# Altium PCB Main_Power_Uint_3rd.PcbDoc (part 1 of 3)
Units mil, origin at the board's own origin, x right, y up, seen from the top; angles counter-clockwise.
Board outline 3820 x 5360 mil, 6 copper layers (Top Layer, GND1, PWR, SIG, GND2, Bottom Layer), stack 34.824 mil thick; 251 components, 157 nets, 795 pads, 616 vias.
Unrouted connection lines stored in the file: 8.
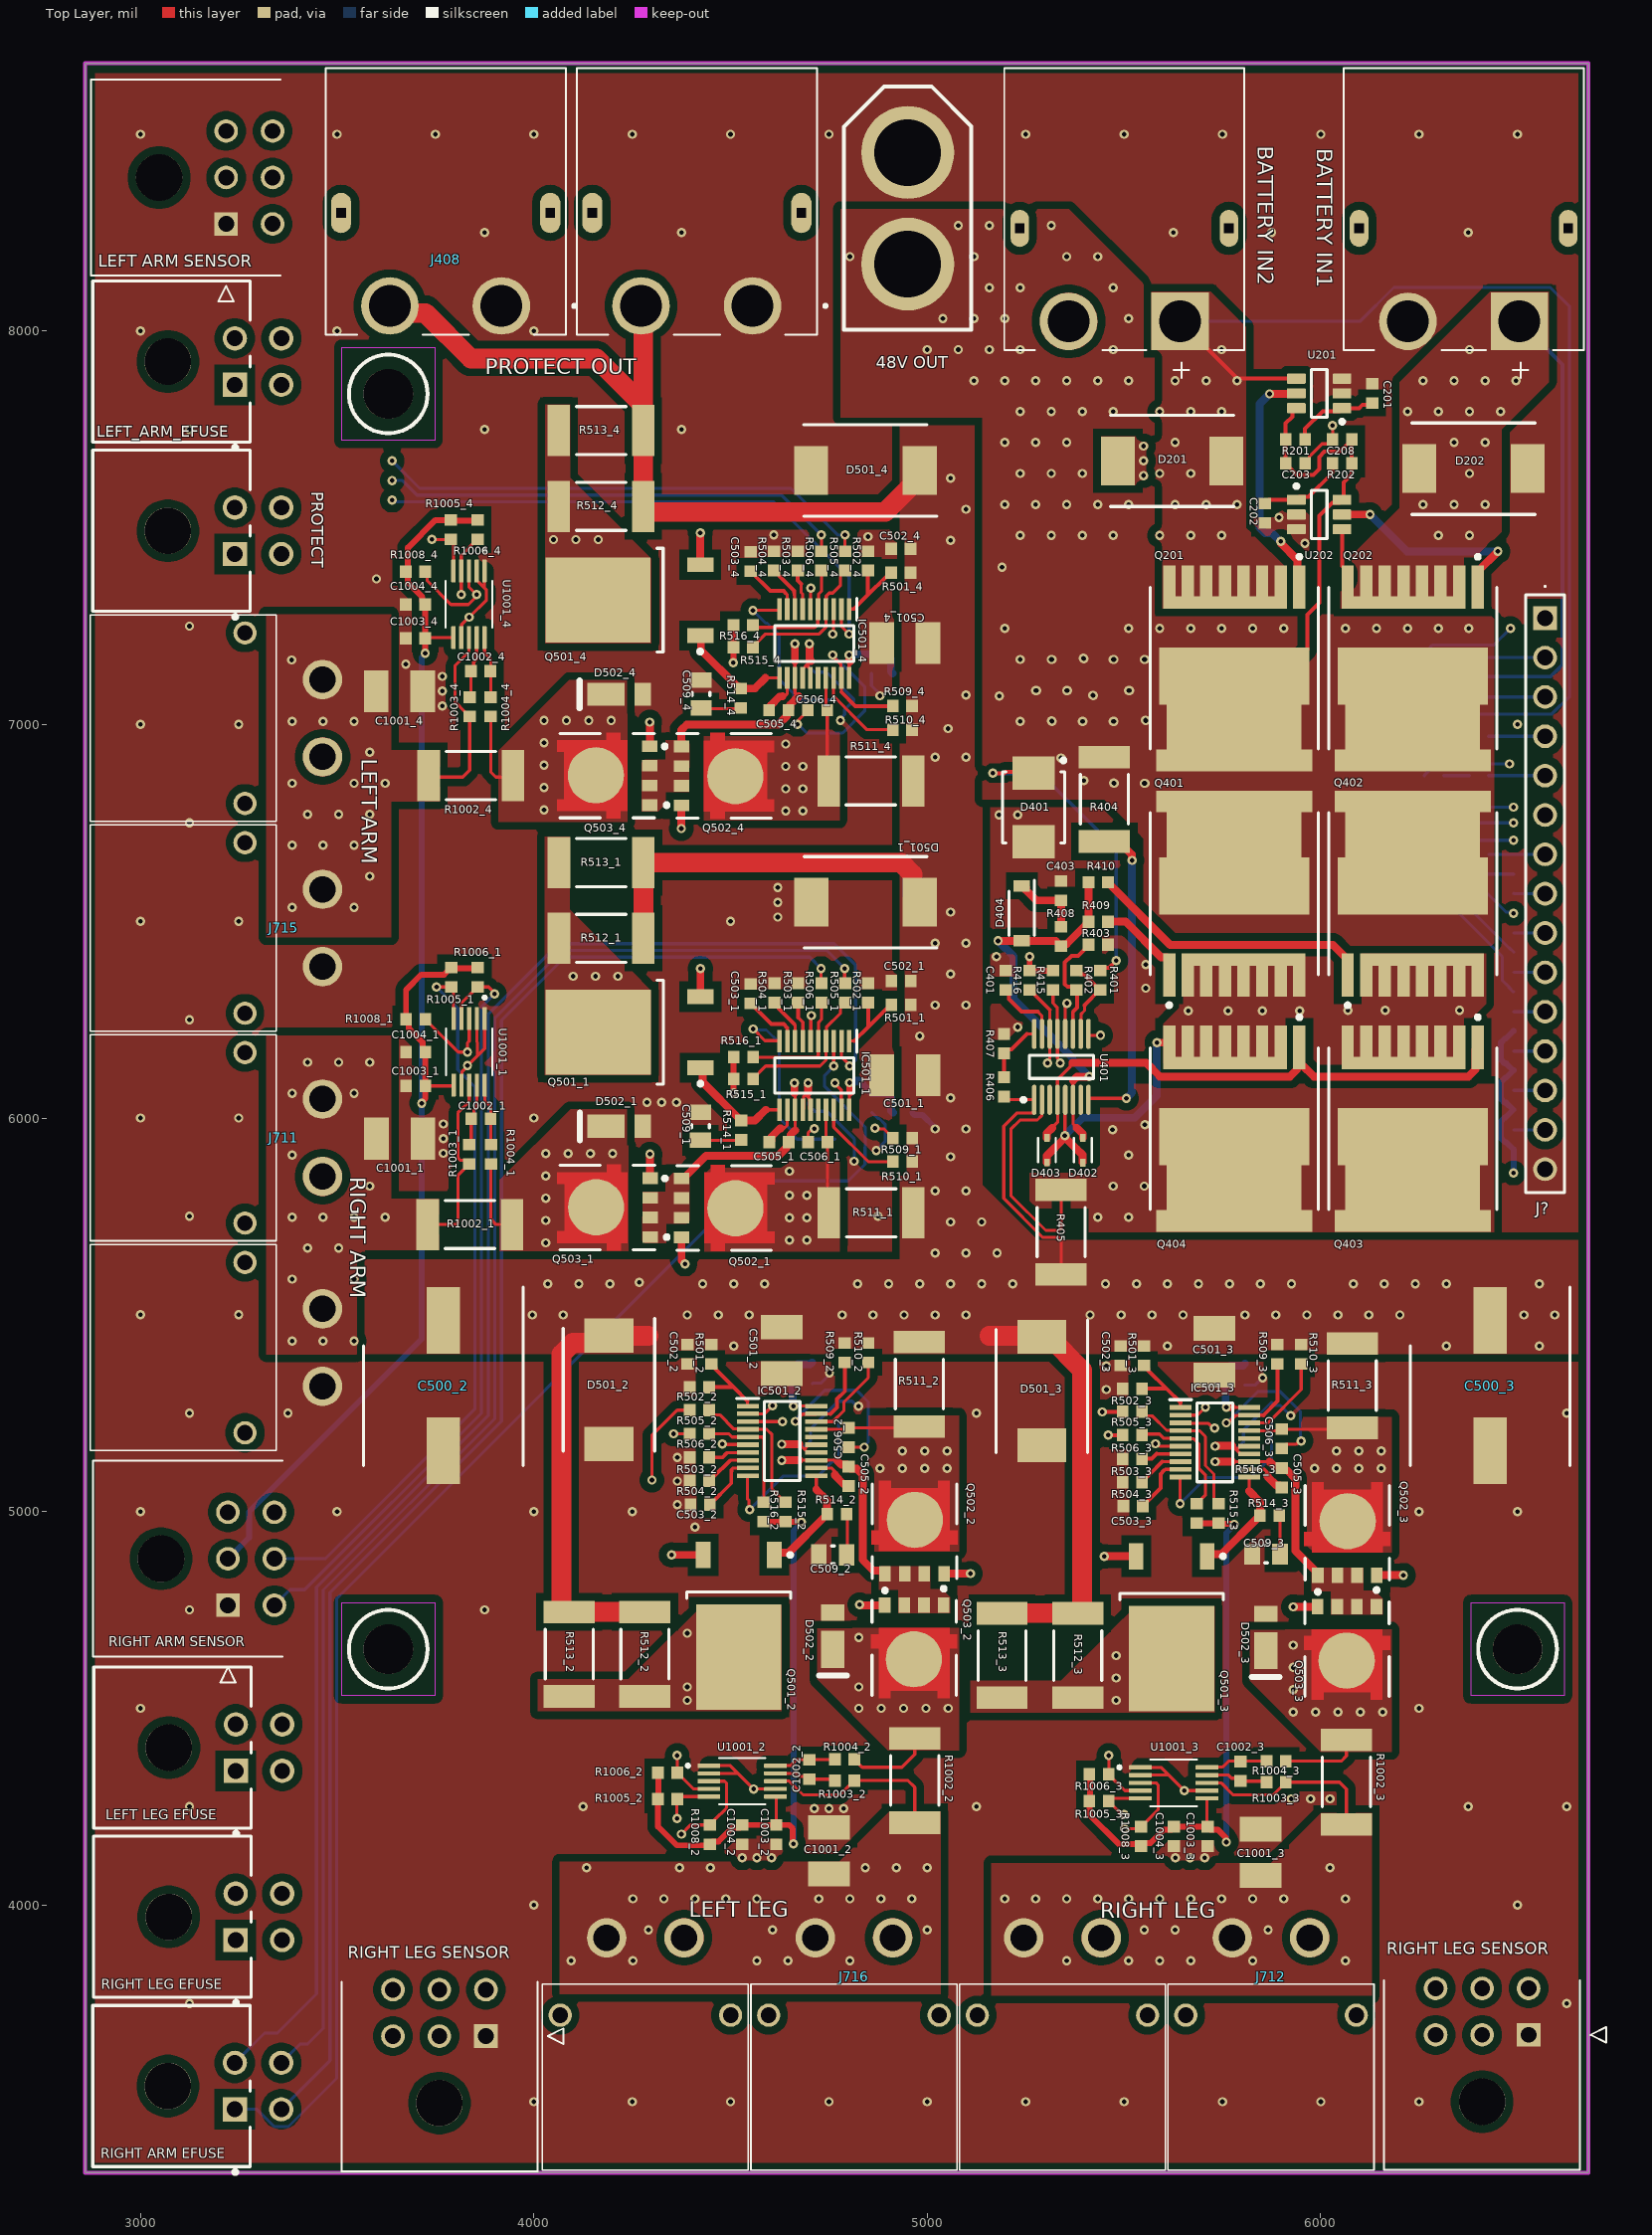
[diagram p0: Top Layer view]
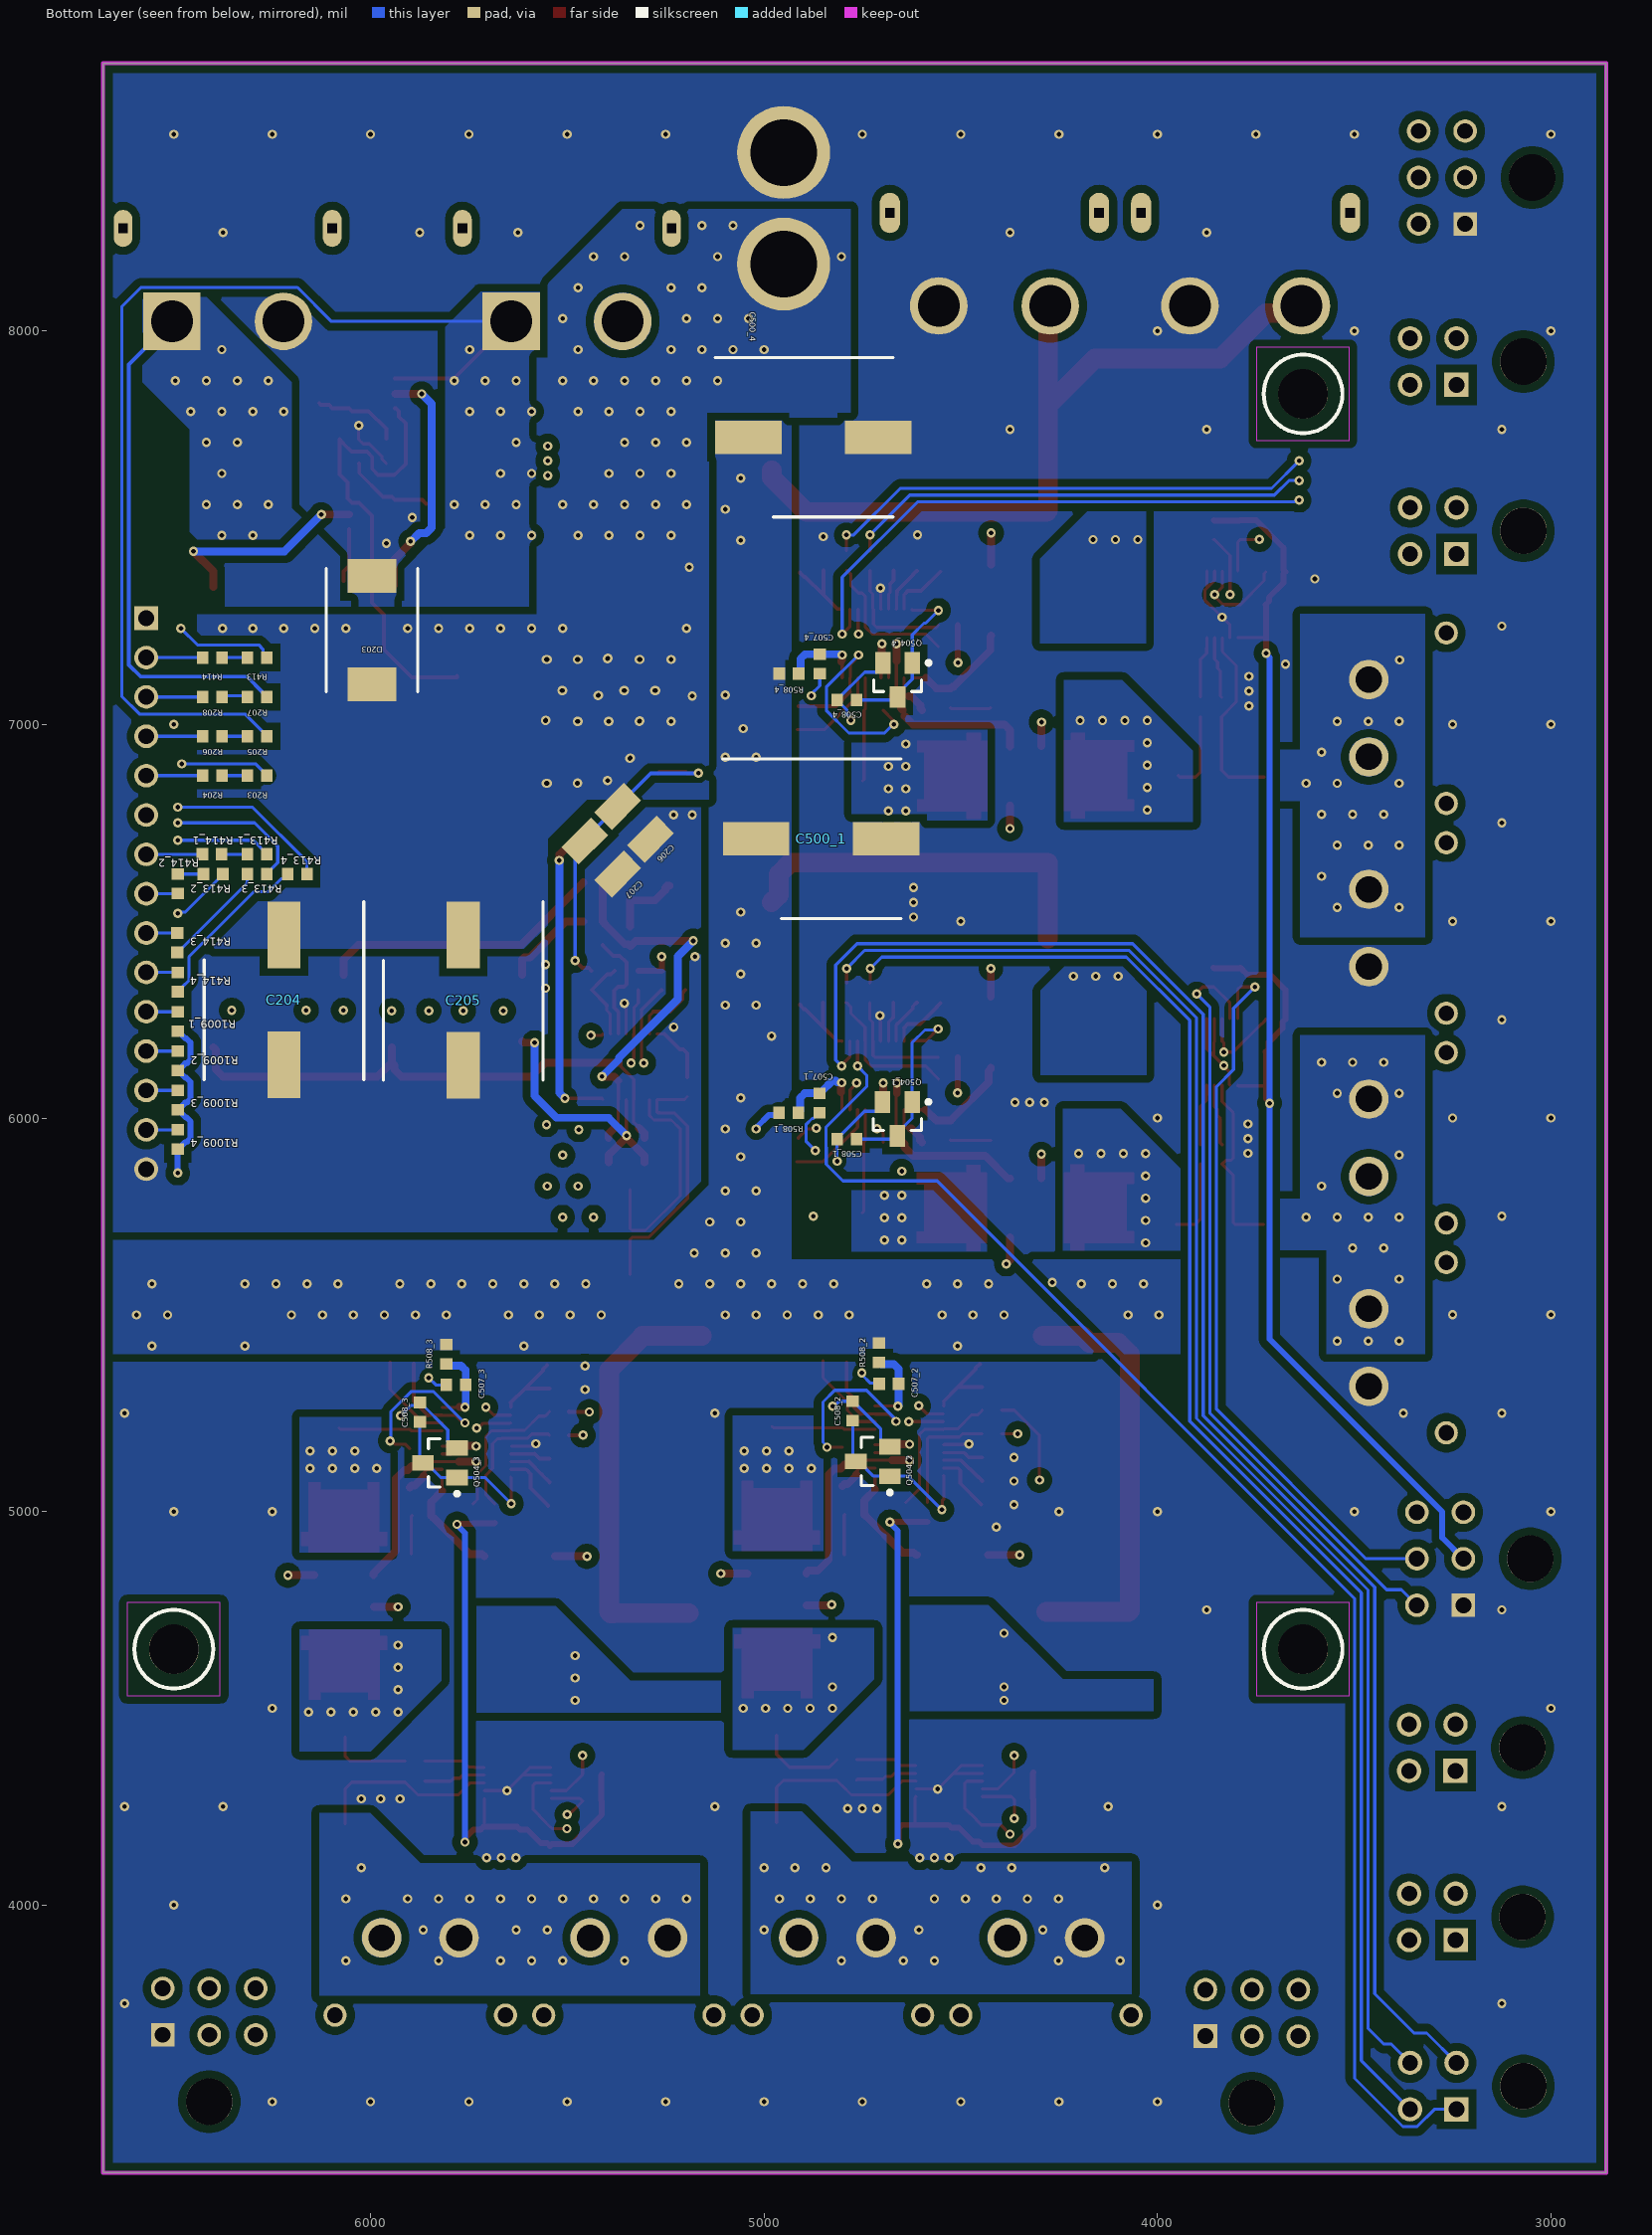
[diagram p1: Bottom Layer view, seen from below]
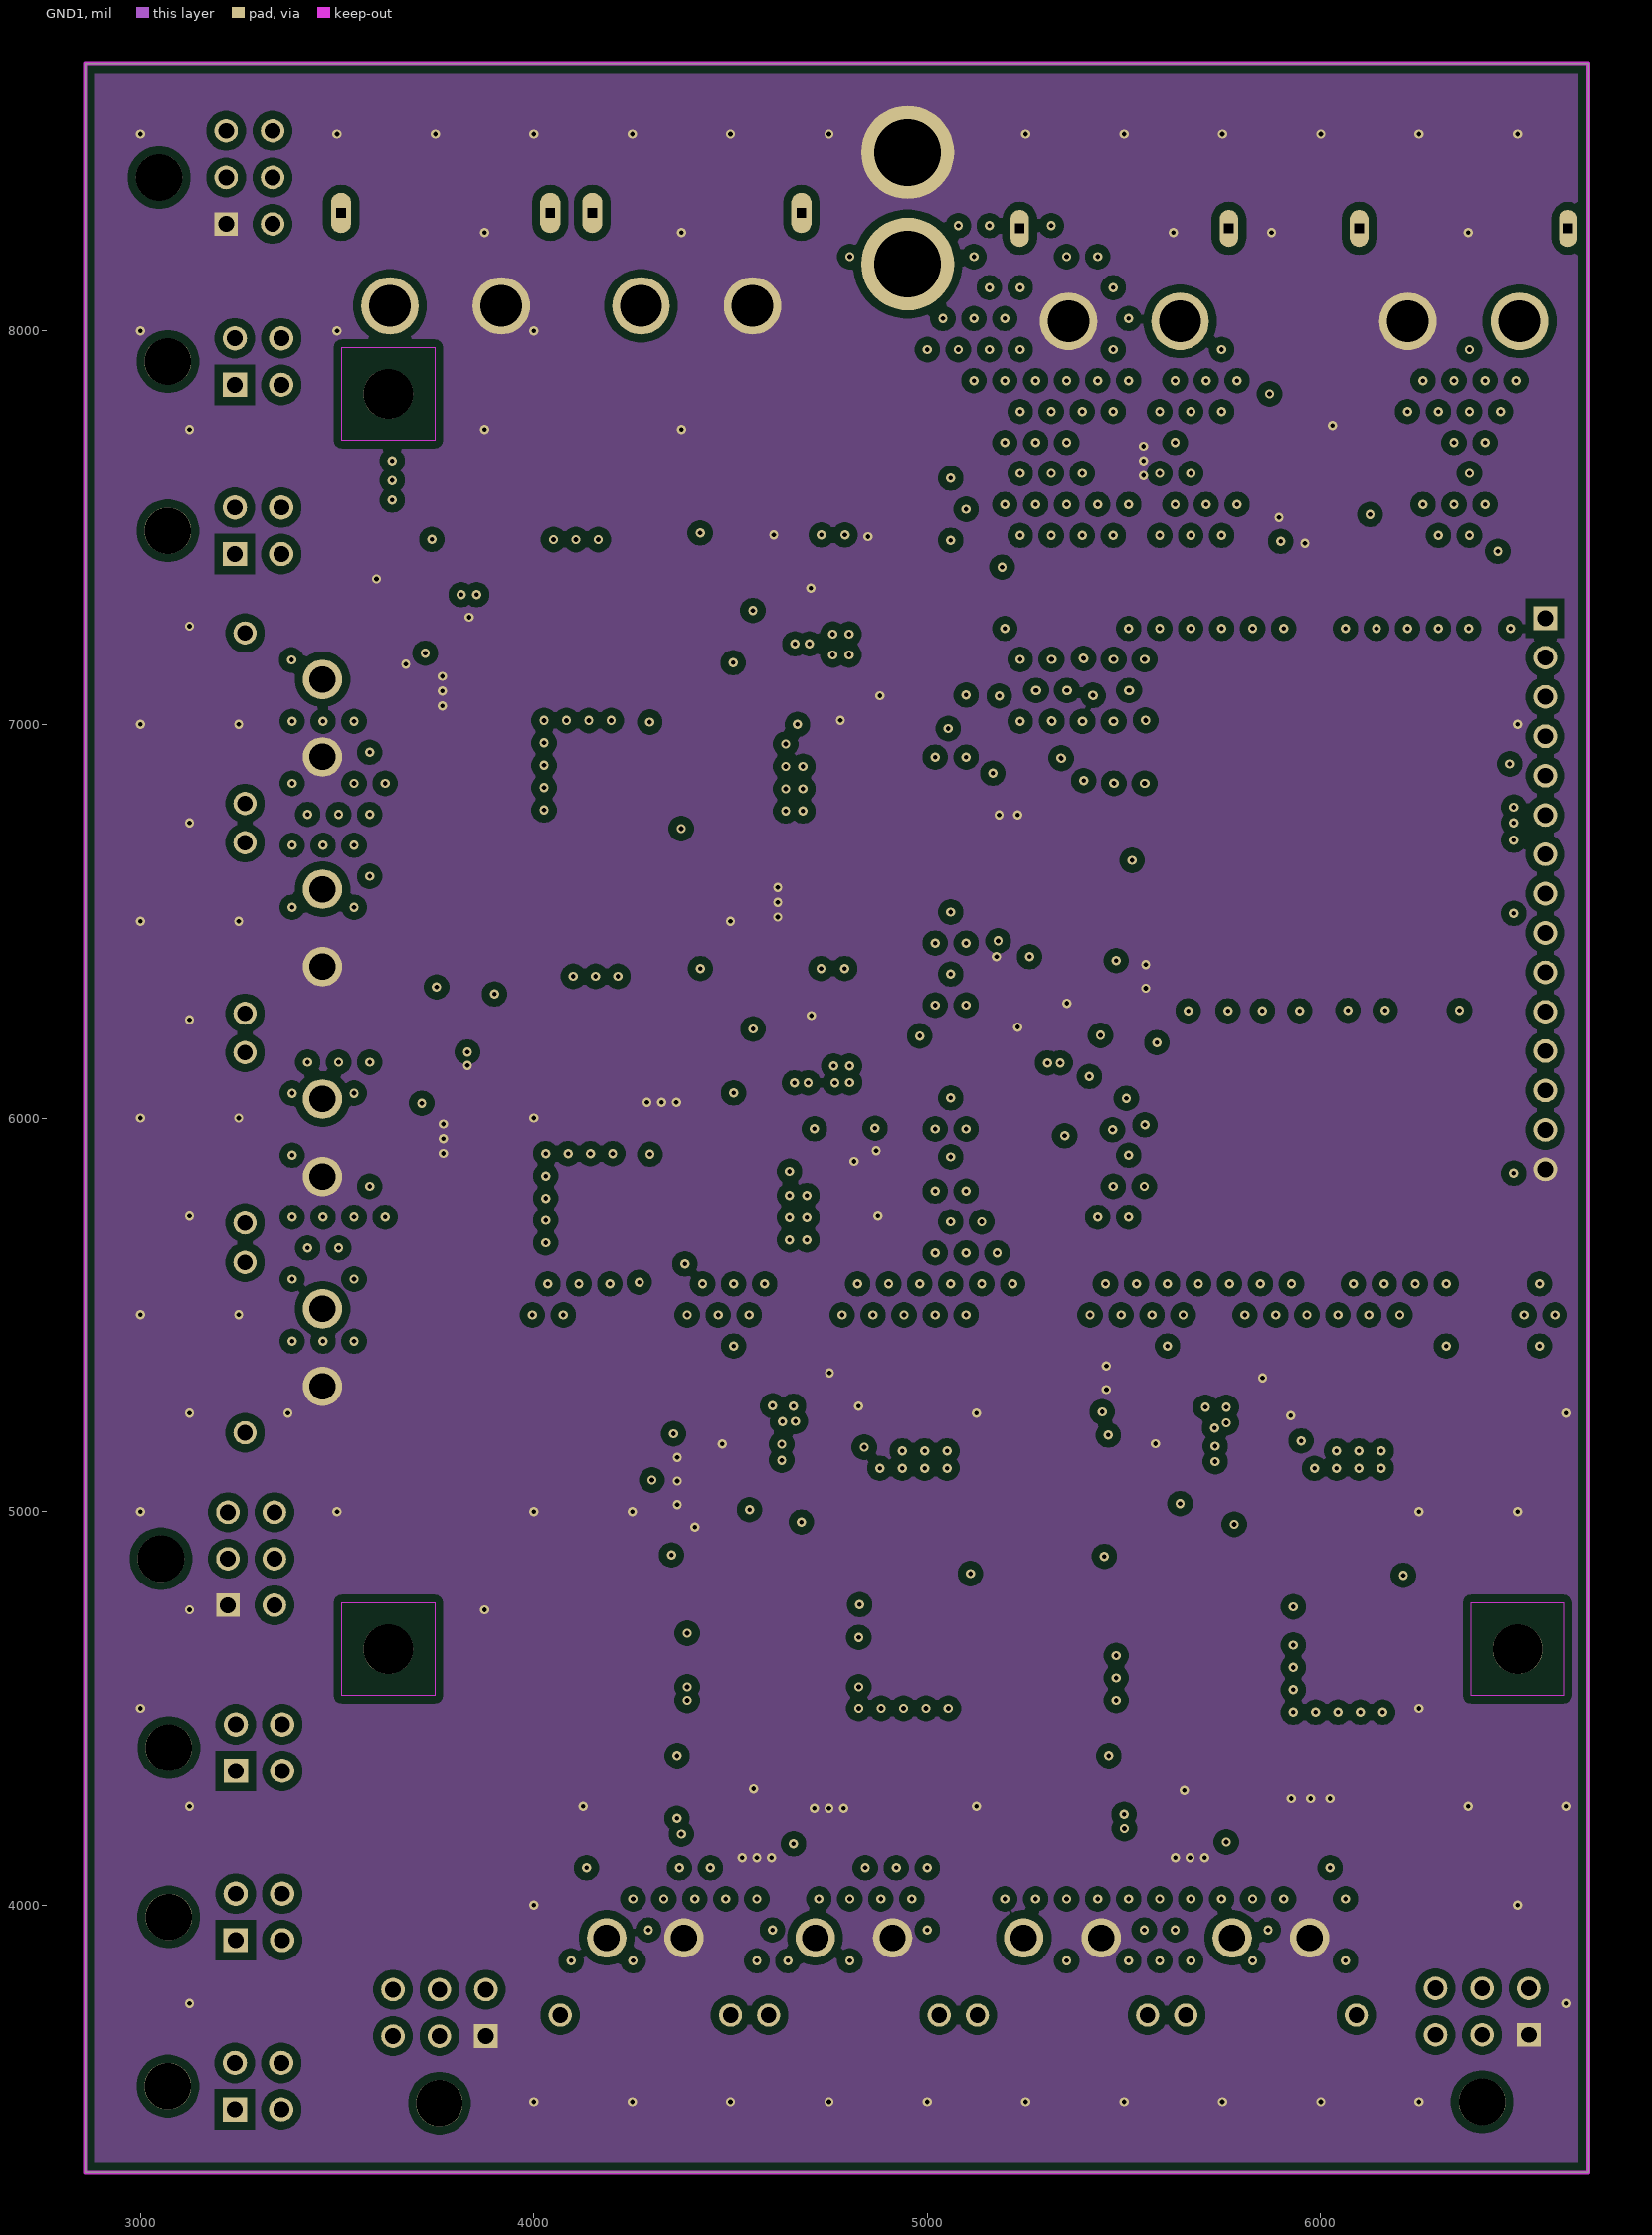
[diagram p2: GND1]
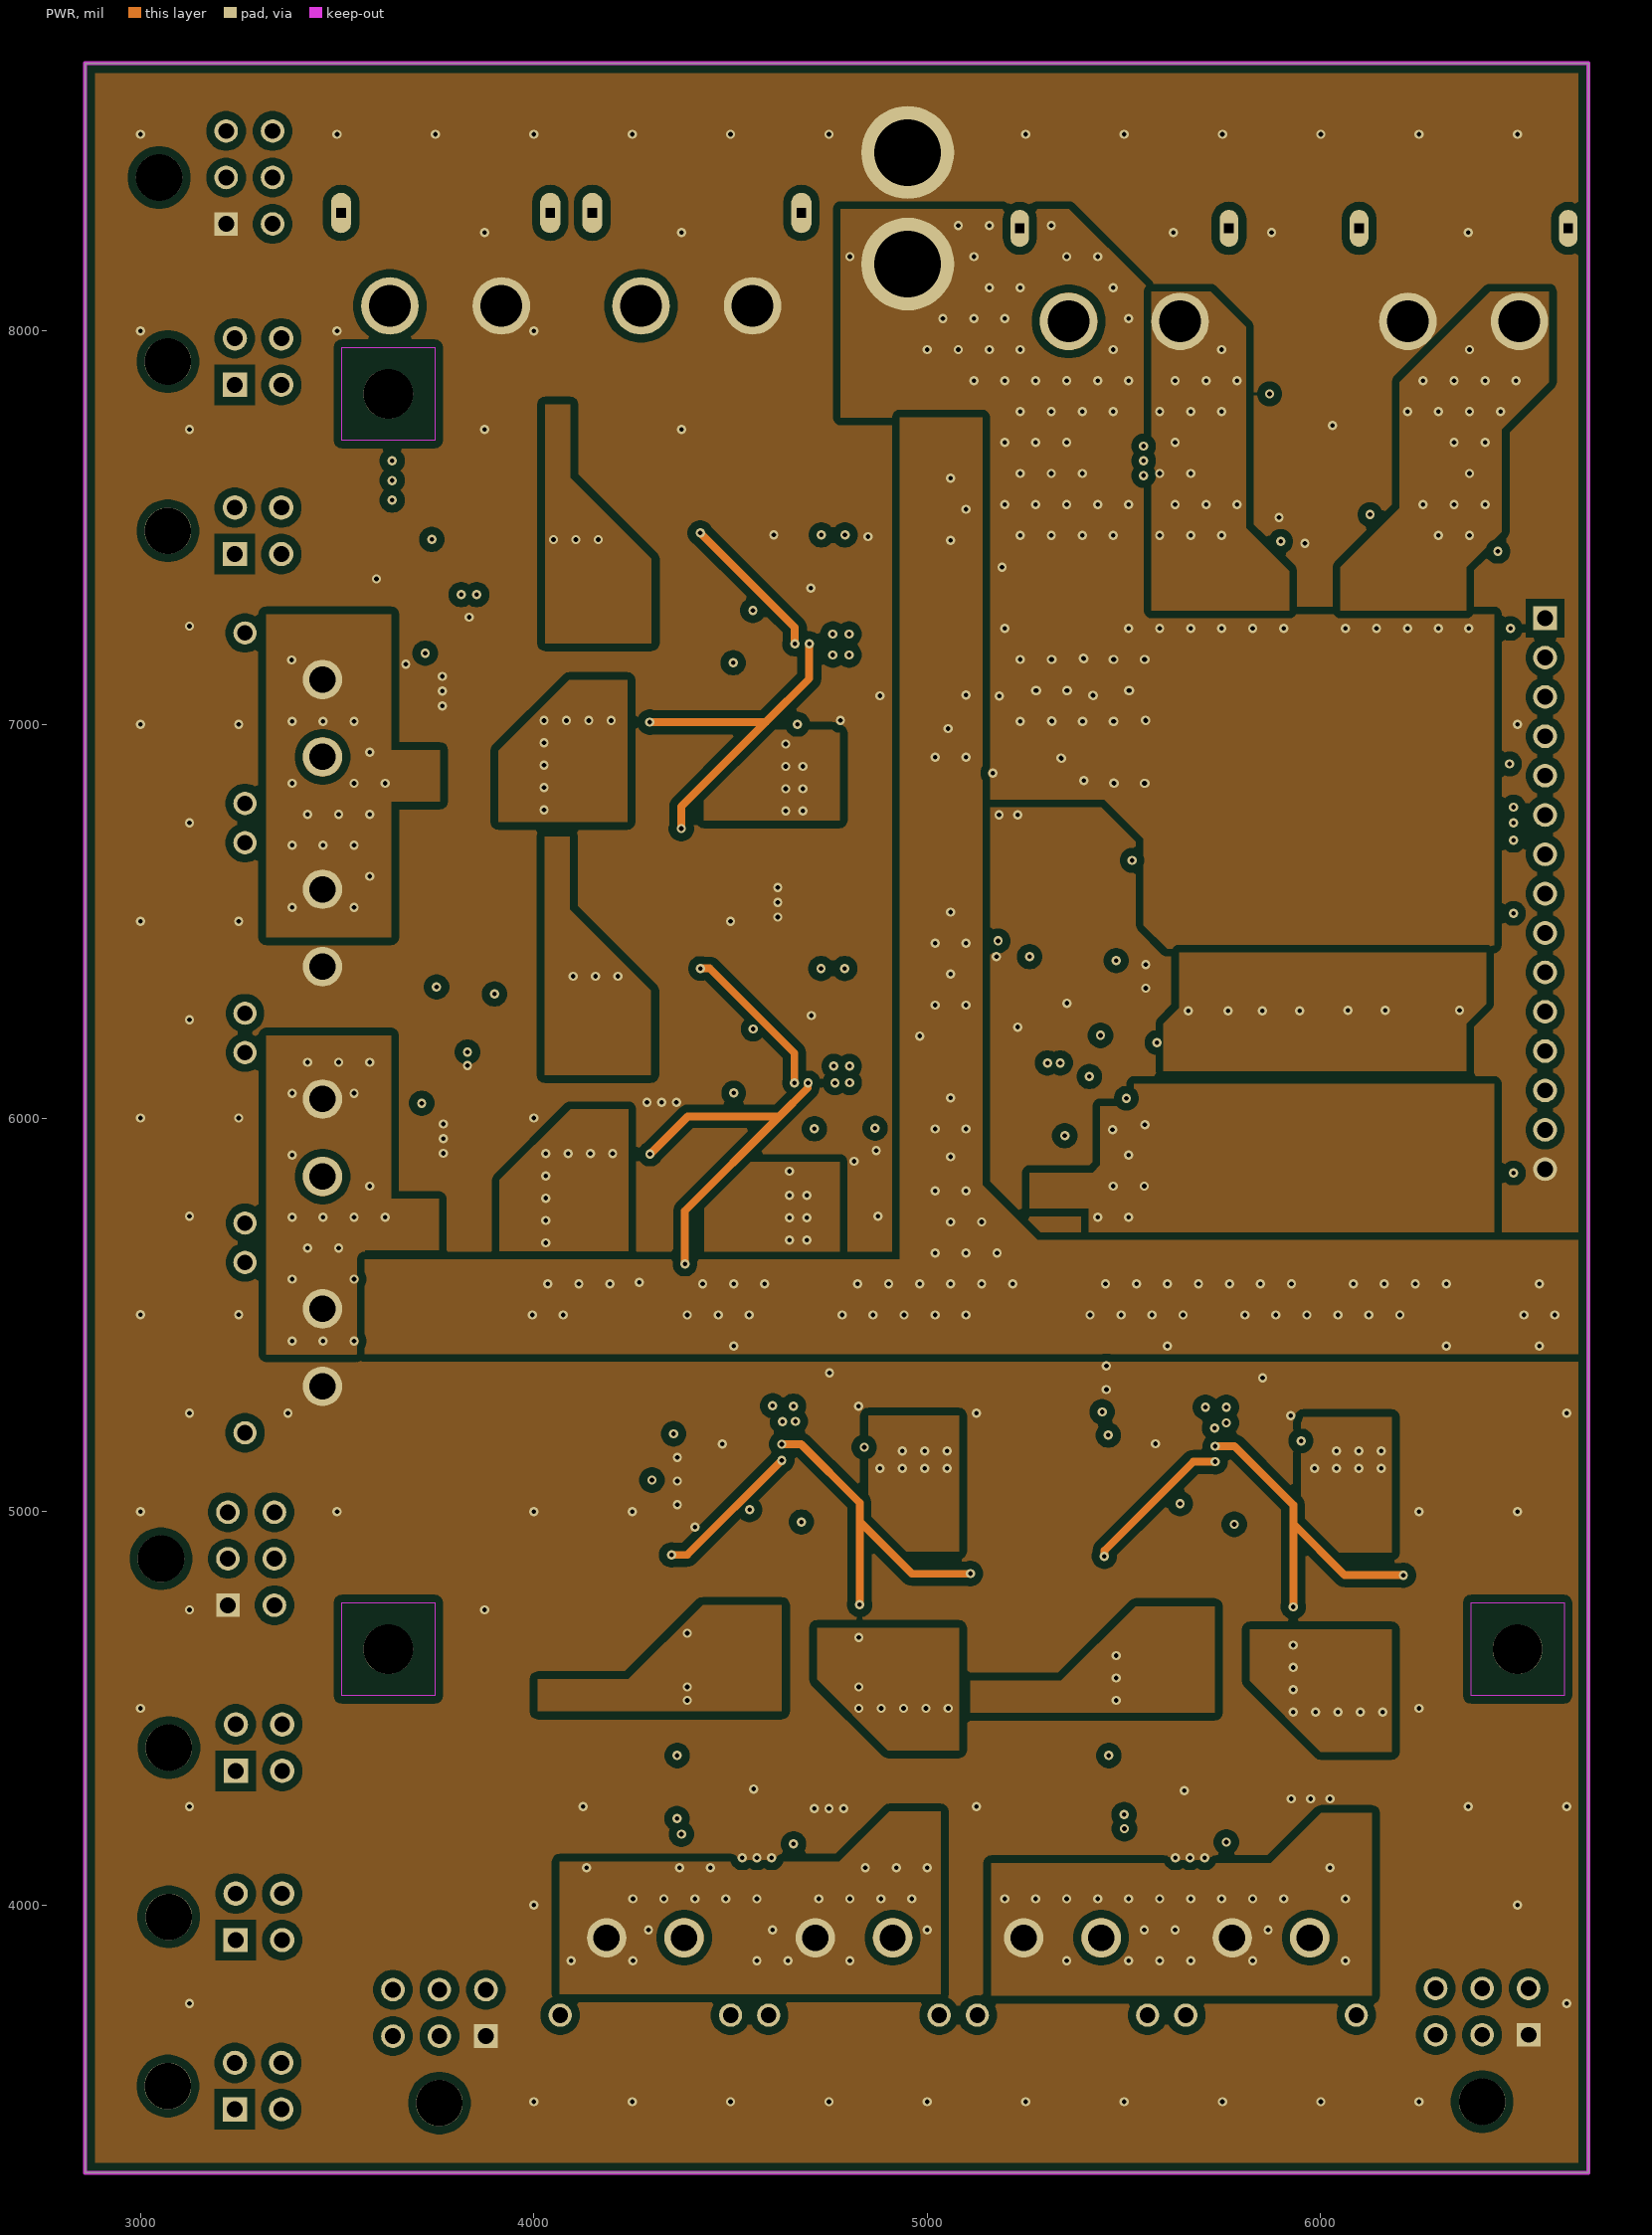
[diagram p3: PWR]
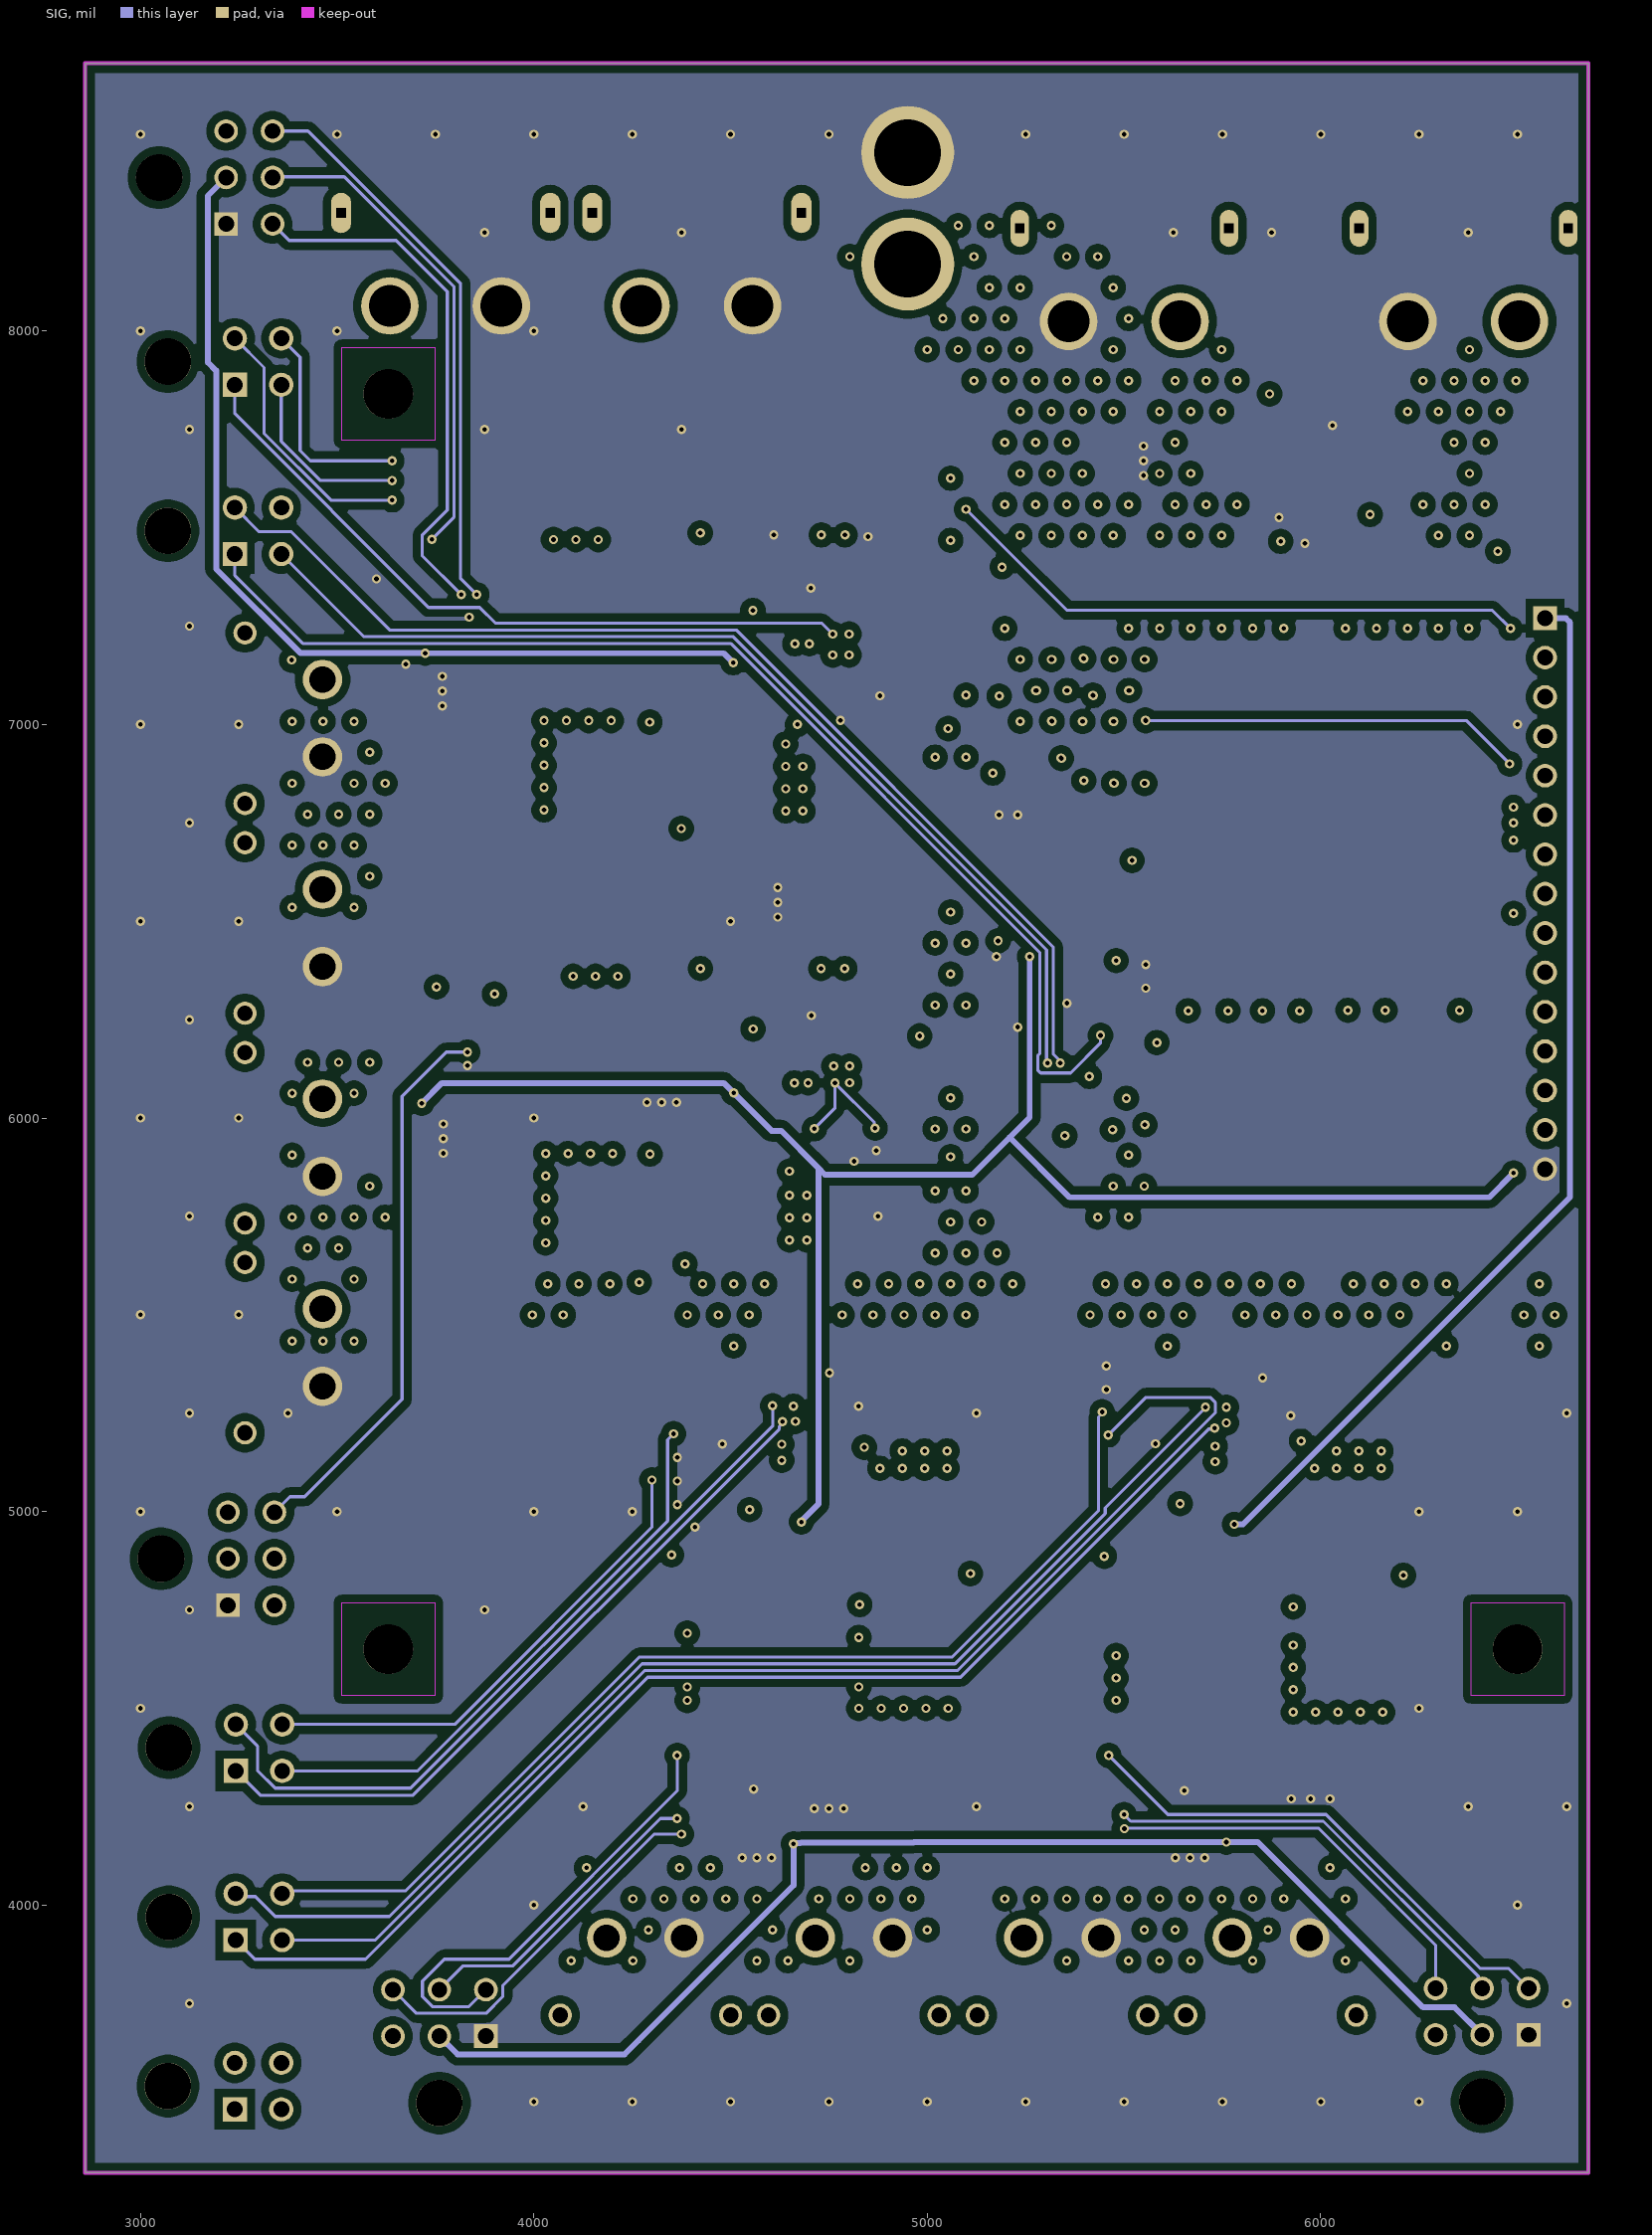
[diagram p4: SIG]
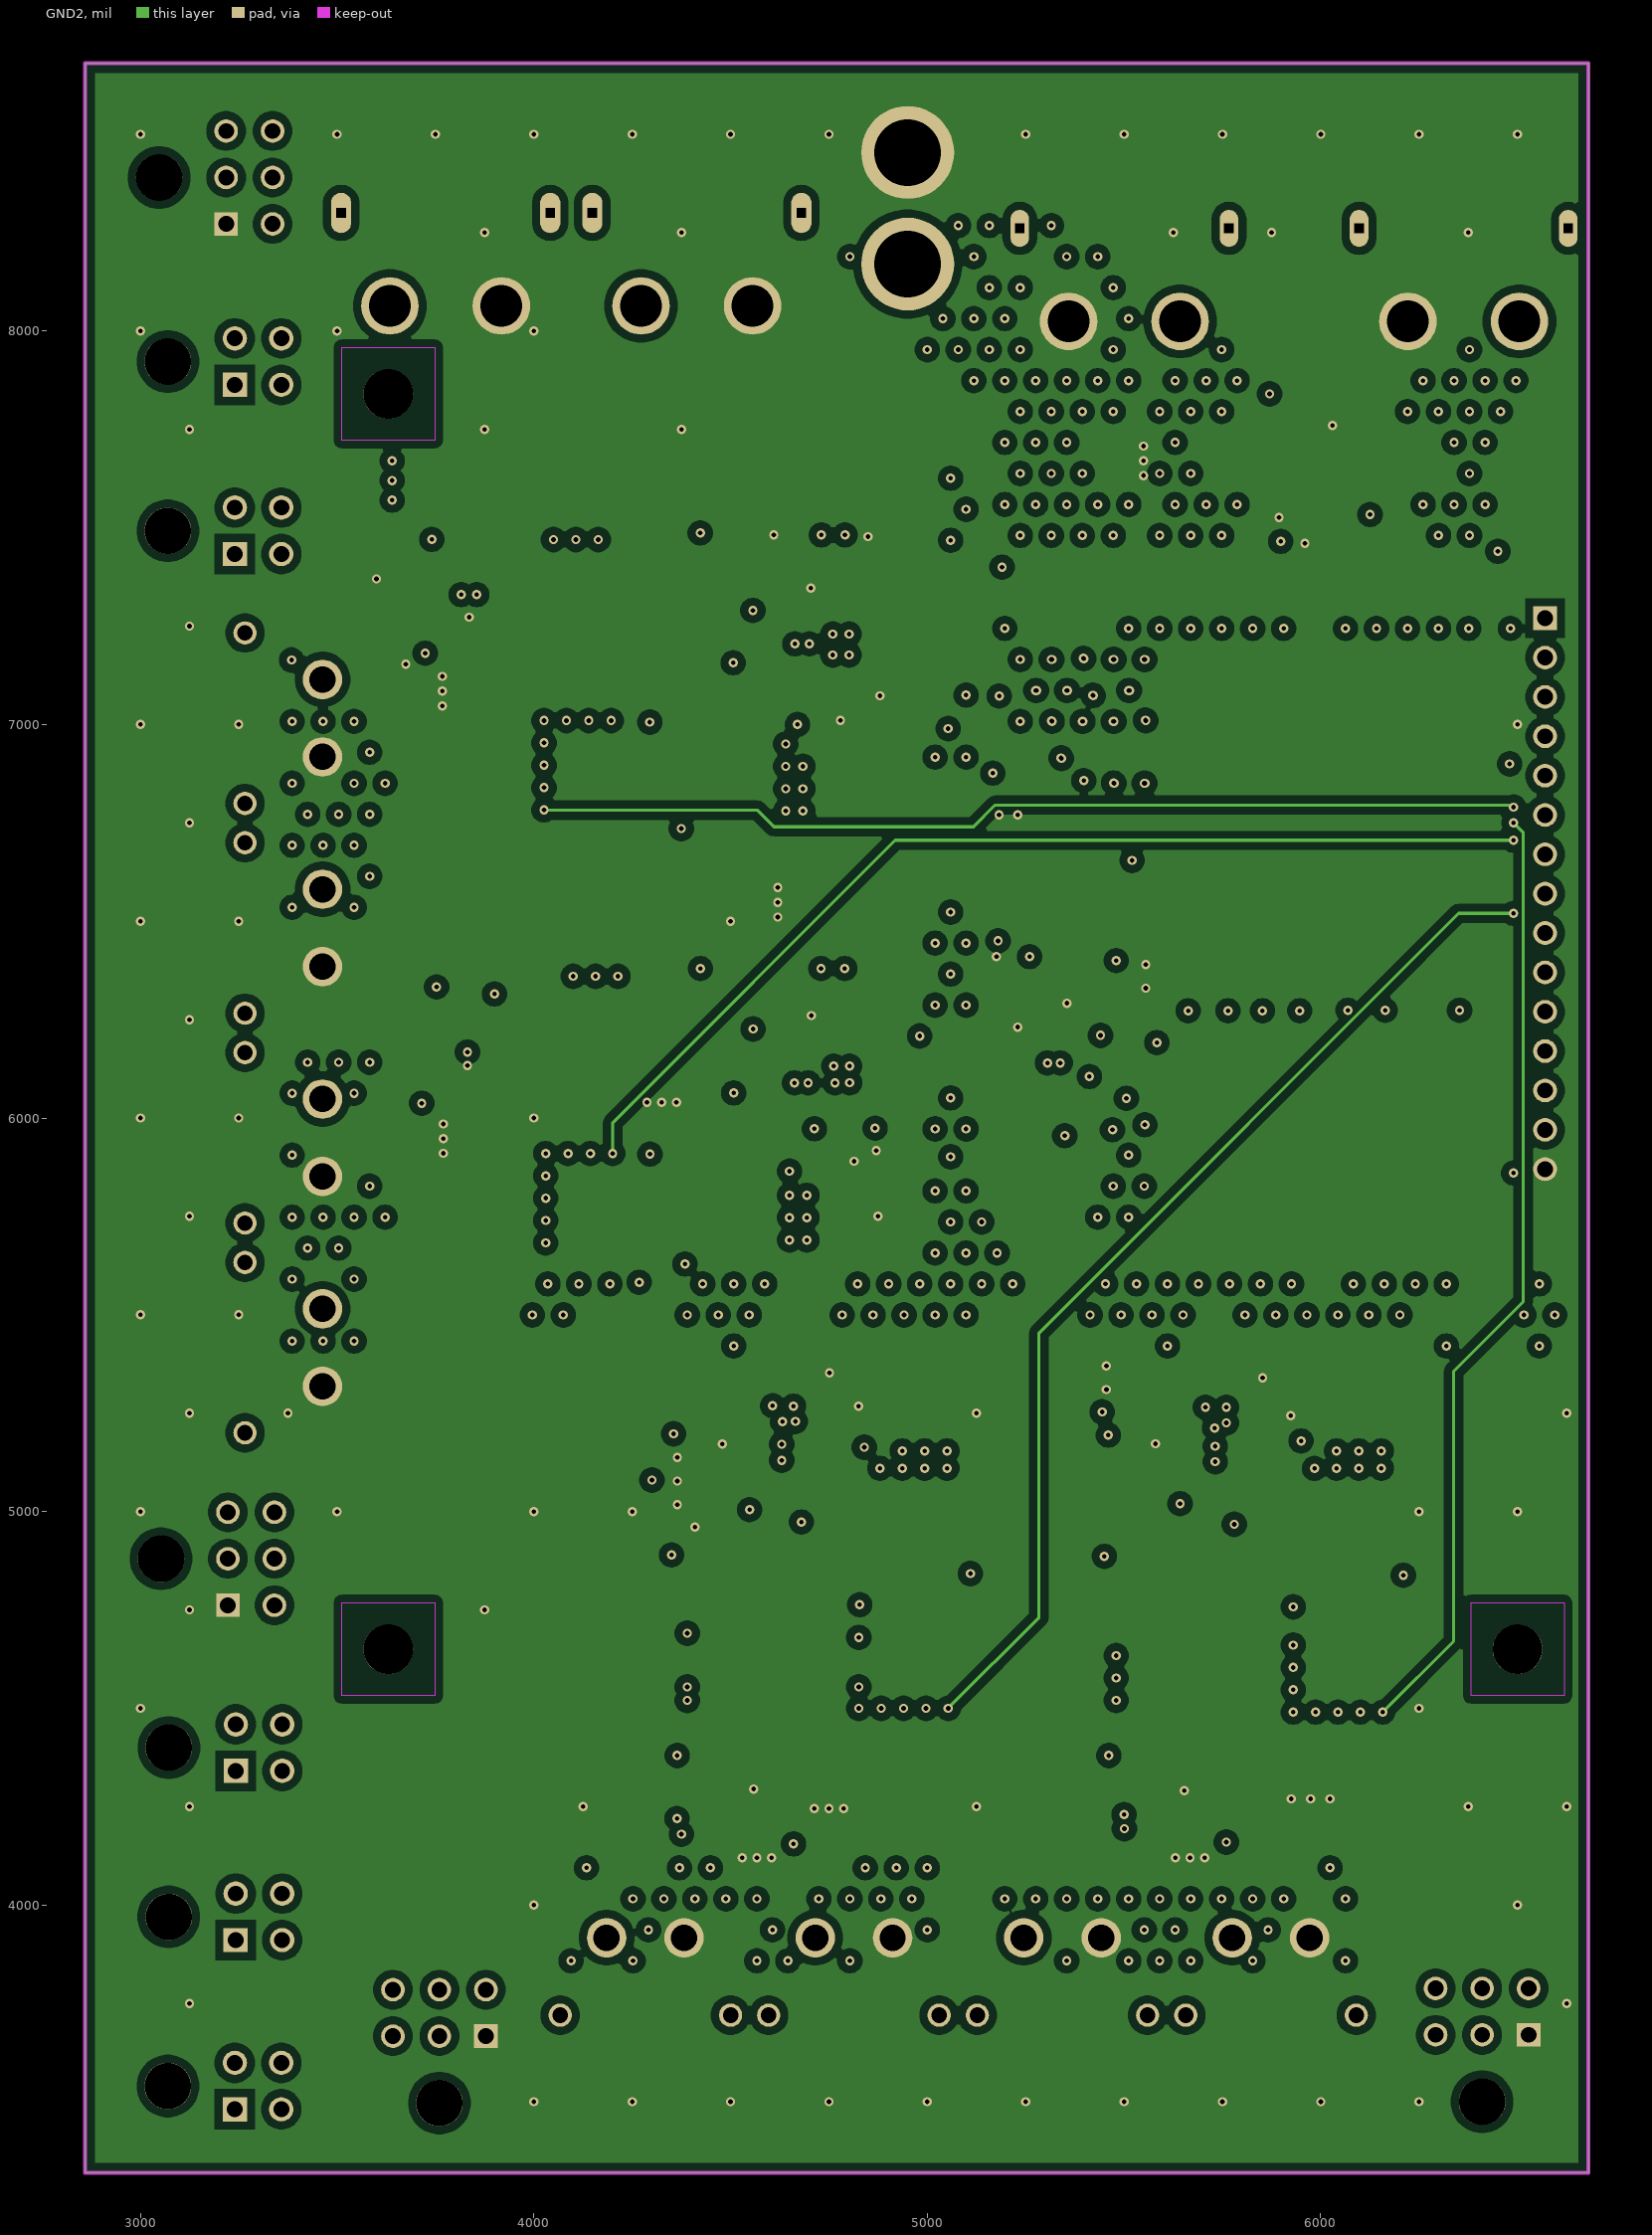
[diagram p5: GND2]
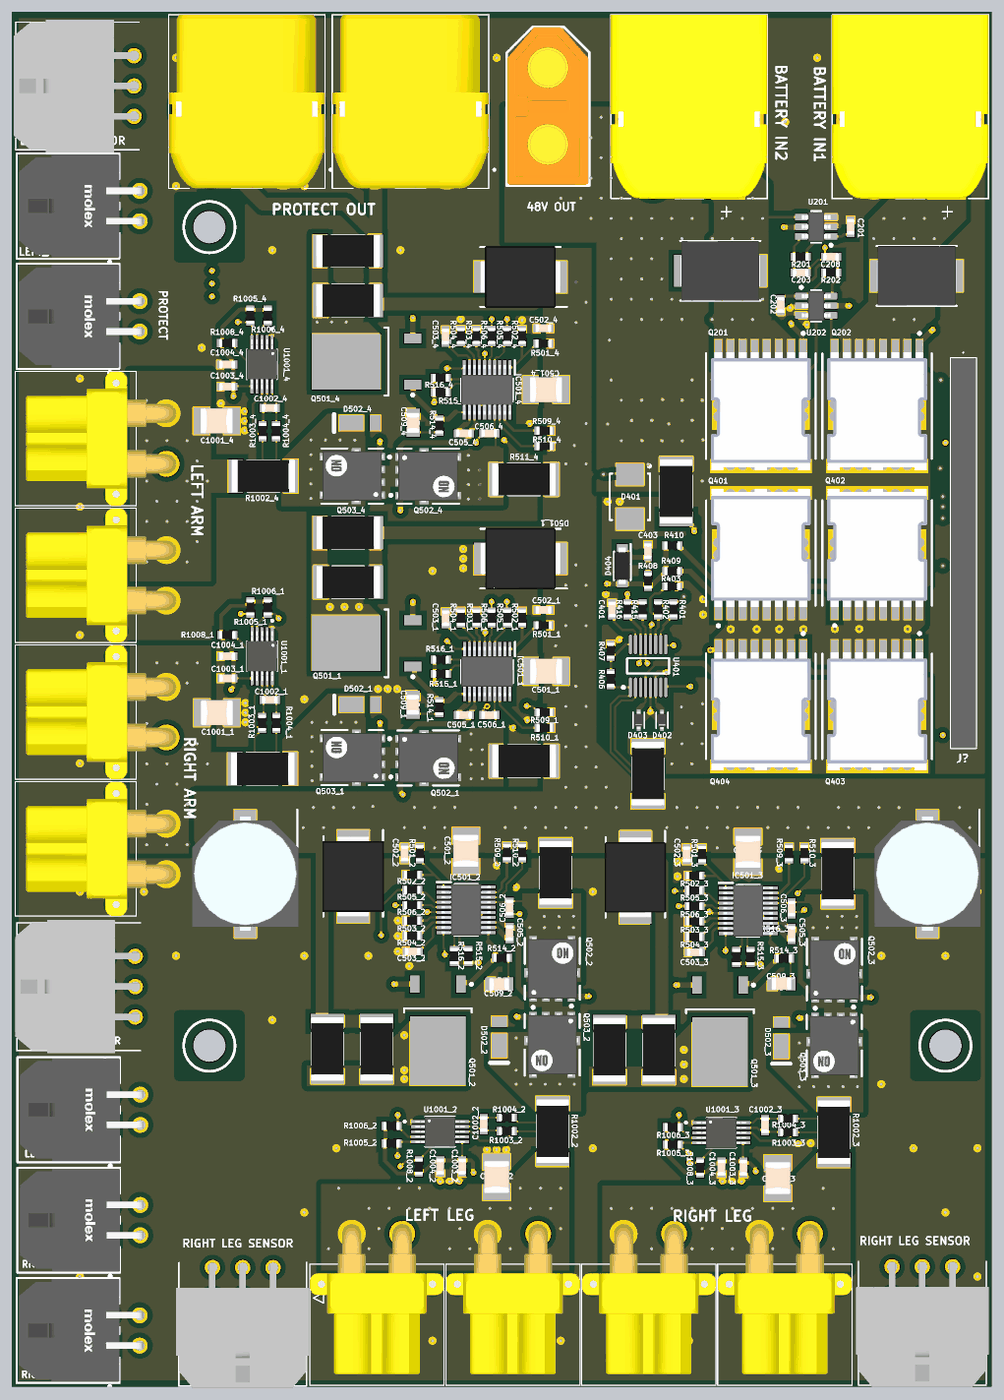
[diagram p8: 3D render of the assembled board from above, using the file's embedded part models]
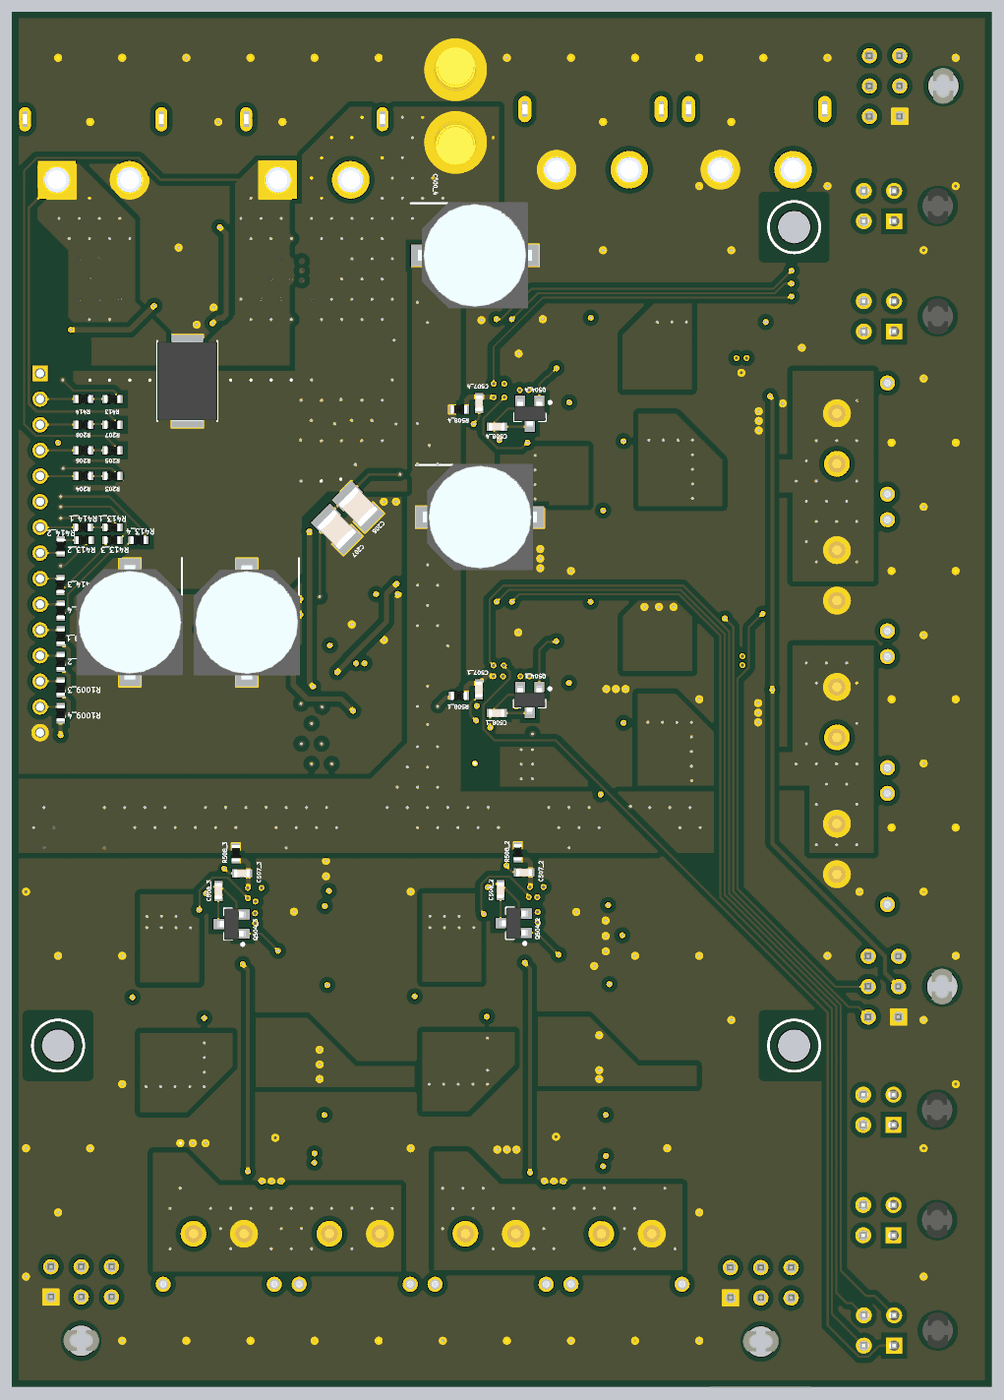
[diagram p9: 3D render of the assembled board from below, using the file's embedded part models]

## Layer stack, top to bottom
Top Solder: solder mask 0.4, Solder Resist, Dk 3.5
Top Layer: signal copper 2.756
Dielectric 2: prepreg 2.8, PP-006, Dk 4.1
GND1: signal copper 1.378
Dielectric 4: prepreg 2.8, PP-006, Dk 4.1
PWR: signal copper 1.378
Dielectric 1: dielectric 12.6, FR-4, Dk 4.8
SIG: signal copper 1.378
Dielectric 5: prepreg 2.8, PP-006, Dk 4.1
GND2: signal copper 1.378
Dielectric 3: prepreg 2.8, PP-006, Dk 4.1
Bottom Layer: signal copper 2.756
Bottom Solder: solder mask 0.4, Solder Resist, Dk 3.5

## Board outline
2860,3320 2860,8680 6680,8680 6680,3320

## Design rules (kind name [scope] priority, off if disabled: settings)
Clearance "Stitching I_SENSE_N" [IsStitchingVia and InNet('I_SENSE_N') vs (IsVia and (Not IsStitchingVia)) Or IsPad] p1: gap=10 ignorepadtopadclearanceinfootprint=TRUE
Clearance Clearance_Polygon [InPolygon] p2: gap=20 ignorepadtopadclearanceinfootprint=TRUE
Clearance [All] p3: gap=9 ignorepadtopadclearanceinfootprint=TRUE
DiffPairsRouting [All] p1: maxlimit=10 minlimit=10 mostfreqgap=10 toplayer_minwidth=7 toplayer_maxwidth=15 toplayer_prefwidth=15 midlayer1_minwidth=15 midlayer1_maxwidth=15 midlayer1_prefwidth=15 midlayer2_minwidth=15 midlayer2_maxwidth=15 midlayer2_prefwidth=15 midlayer3_minwidth=15 midlayer3_maxwidth=15 midlayer3_prefwidth=15 midlayer4_minwidth=15 midlayer4_maxwidth=15 midlayer4_prefwidth=15 bottomlayer_minwidth=15 bottomlayer_maxwidth=15 bottomlayer_prefwidth=15 maxuncoupledlength=500
Height [All] p1: minheight=0 maxheight=3000 prefheight=500
HoleSize [All] p1: absolutevalues=TRUE maxlimit=300 minlimit=1 maxpercent=80.000 minpercent=20.000
PlaneConnect [All] p1: planeconnectstyle=Direct reliefexpansion=20 reliefentries=4 reliefconductorwidth=10 reliefairgap=10
PolygonConnect [All] p1: connectstyle=Direct reliefconductorwidth=10 reliefentries=4 polygonreliefangle="90 Angle" airgapwidth=10
RoutingVias [All] p1: holewidth=28 width=50 viastyle="Through Hole" minholewidth=28 minwidth=50 maxholewidth=28 maxwidth=50
SilkToSolderMaskClearance [IsPad] p1: minsilkscreentomaskgap=5 clearancetoexposedcopper=TRUE
SolderMaskExpansion [All] p1: expansion=4 istentingtop=FALSE
SupplyNets "Schematic Supply Nets_7" [InNet('3.3V_4')] p1: voltage=0.000
SupplyNets "Schematic Supply Nets_6" [InNet('3.3V_1')] p2: voltage=0.000
SupplyNets "Schematic Supply Nets_5" [InNet('3.3V_3')] p3: voltage=0.000
SupplyNets "Schematic Supply Nets_4" [InNet('3.3V_2')] p4: voltage=0.000
SupplyNets "Schematic Supply Nets_2" [InNet('3V3')] p5: voltage=0.000
SupplyNets "Schematic Supply Nets_3" [InNet('3.3V')] p6: voltage=0.000
SupplyNets "Schematic Supply Nets_1" [InNet('GND')] p7: voltage=0.000
SupplyNets "Schematic Supply Nets" [InNet('VSYS_IN')] p8: voltage=0.000
Width [All] p1: maxlimit=50 minlimit=8 preferedwidth=8 minimp=50.000000 maximp=50.000000 favimp=50.000000
25 further rules are at their usual default settings.

## Classes and differential pairs
net class LED_EFUSE_OUT[1..4]: LED_EFUSE_OUT1 LED_EFUSE_OUT2 LED_EFUSE_OUT3 LED_EFUSE_OUT4
net class LED_INA_VS[1..4]: LED_INA_VS1 LED_INA_VS2 LED_INA_VS3 LED_INA_VS4
component class Sensing4: C1001_4 C1002_4 C1003_4 C1004_4 "LEFT ARM SENSOR" R1002_4 R1003_4 R1004_4 R1005_4 R1006_4 R1008_4 R1009_4 U1001_4
component class Sensing3: C1001_3 C1002_3 C1003_3 C1004_3 R1002_3 R1003_3 R1004_3 R1005_3 R1006_3 R1008_3 R1009_3 "RIGHT LEG SENSOR" U1001_3
component class Sensing2: C1001_2 C1002_2 C1003_2 C1004_2 R1002_2 R1003_2 R1004_2 R1005_2 R1006_2 R1008_2 R1009_2 "RIGHT LEG SENSOR" U1001_2
component class Sensing1: C1001_1 C1002_1 C1003_1 C1004_1 R1002_1 R1003_1 R1004_1 R1005_1 R1006_1 R1008_1 R1009_1 "RIGHT ARM SENSOR" U1001_1
net class SENSE_OUT[1..4]: SENSE_OUT1 SENSE_OUT2 SENSE_OUT3 SENSE_OUT4
net class EFUSE_RAW_OUT[1..4]: EFUSE_RAW_OUT1 EFUSE_RAW_OUT2 EFUSE_RAW_OUT3 EFUSE_RAW_OUT4
channel class Sensing: Sensing1 Sensing2 Sensing3 Sensing4
polygon class MainCurrent_Polygon: EFUSE_RAW_OUT3_L06_P055 I_SENSE_4_P_L03_P028 NETJ405_3_L01_P027 NONET_L03_P010
component class ORING: "48V OUT" "BATTERY IN1" "BATTERY IN2" C201 C202 C203 C204 C205 C206 C207 C208 D201 D202 D203 Q201 Q202 R201 R202 R203 R204 R205 R206 R207 R208 U201 U202
component class CONNECTOR: J711 J712 J715 J716 "LEFT ARM" "LEFT LEG" "LEFT LEG EFUSE" LEFT_ARM_EFUSE PROTECT "RIGHT ARM" "RIGHT ARM EFUSE" "RIGHT LEG" "RIGHT LEG EFUSE"
channel class e-Fuse: e-Fuse1 e-Fuse2 e-Fuse3 e-Fuse4
net class INP_G[1..4]: INP_G1 INP_G2 INP_G3 INP_G4
net class INP[1..4]: INP1 INP2 INP3 INP4
net class FLT_T[1..4]: FLT_T1 FLT_T2 FLT_T3 FLT_T4
net class FLT_I[1..4]: FLT_I1 FLT_I2 FLT_I3 FLT_I4
component class e-Fuse4: C500_4 C501_4 C502_4 C503_4 C505_4 C506_4 C507_4 C508_4 C509_4 D501_4 D502_4 IC501_4 Q501_4 Q502_4 Q503_4 Q504_4 R413_4 R414_4 R501_4 R502_4 R503_4 R504_4 R505_4 R506_4 R508_4 R509_4 R510_4 R511_4 R512_4 R513_4 R514_4 R515_4 R516_4
component class e-Fuse3: C500_3 C501_3 C502_3 C503_3 C505_3 C506_3 C507_3 C508_3 C509_3 D501_3 D502_3 IC501_3 Q501_3 Q502_3 Q503_3 Q504_3 R413_3 R414_3 R501_3 R502_3 R503_3 R504_3 R505_3 R506_3 R508_3 R509_3 R510_3 R511_3 R512_3 R513_3 R514_3 R515_3 R516_3
component class e-Fuse2: C500_2 C501_2 C502_2 C503_2 C505_2 C506_2 C507_2 C508_2 C509_2 D501_2 D502_2 IC501_2 Q501_2 Q502_2 Q503_2 Q504_2 R413_2 R414_2 R501_2 R502_2 R503_2 R504_2 R505_2 R506_2 R508_2 R509_2 R510_2 R511_2 R512_2 R513_2 R514_2 R515_2 R516_2
component class e-Fuse1: C500_1 C501_1 C502_1 C503_1 C505_1 C506_1 C507_1 C508_1 C509_1 D501_1 D502_1 IC501_1 Q501_1 Q502_1 Q503_1 Q504_1 R413_1 R414_1 R501_1 R502_1 R503_1 R504_1 R505_1 R506_1 R508_1 R509_1 R510_1 R511_1 R512_1 R513_1 R514_1 R515_1 R516_1
component class PROTECT: C401 C403 D401 D402 D403 D404 J408 "PROTECT OUT" Q401 Q402 Q403 Q404 R401 R402 R403 R404 R405 R406 R407 R408 R409 R410 R413 R414 R415 R416 U401
differential pair PROTECT: +I_SENSE_P -I_SENSE_N

## Components (designator, comment, footprint, x,y, rotation, side; value= is the part's Value field where it differs from the comment)
"48V OUT" "XT_60F" XT60_F 4950,8311.73 r270 top
"BATTERY IN1" "XT60PW-M" XT60PW-M 6363.12,8260.63 r0 top
"BATTERY IN2" "XT60PW-M" XT60PW-M 5500.73,8260.63 r0 top
C201 "C_0603_0P1UF_10P_100V_X7R" C0603 6130.4,7841.38 r270 top
C202 "C_0603_0P1UF_10P_100V_X7R" C0603 5858.19,7536.46 r90 top
C203 "C_0603_0P1UF_10P_100V_X7R" C0603 5935.41,7663.44 r180 top
C204 "47µF" CAPAE1030X1050N 6220,6300 r270 bottom
C205 "47µF" CAPAE1030X1050N 5764.19,6299.14 r270 bottom
C206 "C_1210_4U7F_10P_100V_X7R" C1210 5330,6750 r45 bottom
C207 "C_1210_4U7F_10P_100V_X7R" C1210 5413.52,6661.76 r45 bottom
C208 "C_0603_0P1UF_10P_100V_X7R" C0603 6054.1,7724.8 r0 top
C401 "C_0603_470NF_10P_50V_X7R" C0603 5199.88,6350 r270 top
C403 "C_0603_47NF_10P_100V_X7R" C0603 5340,6577.56 r270 top
C500_1 "47µF" CAPAE1030X1050N 4854.65,6710 r180 bottom (schematic designator C500)
C500_2 "47µF" CAPAE1030X1050N 3770,5320 r270 top (schematic designator C500)
C500_3 "47µF" CAPAE1030X1050N 6430,5320 r270 top (schematic designator C500)
C500_4 "47µF" CAPAE1030X1050N 4874.65,7730 r180 bottom (schematic designator C500)
C501_1 "C_1210_10UF_10P_100V_X7R" C1210 4943.26,6108.9 r0 top (schematic designator C501)
C501_2 "C_1210_10UF_10P_100V_X7R" C1210 4630,5409.55 r90 top (schematic designator C501)
C501_3 "C_1210_10UF_10P_100V_X7R" C1210 5730,5406.07 r90 top (schematic designator C501)
C501_4 "C_1210_10UF_10P_100V_X7R" C1210 4942.83,7206.73 r0 top (schematic designator C501)
C502_1 "C_0603_0P1UF_10P_100V_X7R" C0603 4933.1,6348.03 r0 top (schematic designator C502)
C502_2 "C_0603_0P1UF_10P_100V_X7R" C0603 4390.87,5399.4 r90 top (schematic designator C502)
C502_3 "C_0603_0P1UF_10P_100V_X7R" C0603 5490.87,5395.91 r90 top (schematic designator C502)
C502_4 "C_0603_0P1UF_10P_100V_X7R" C0603 4932.67,7445.86 r0 top (schematic designator C502)
C503_1 "C_0603_22UF_20P_10V_X7R" C0603 4551.18,6316.07 r270 top (schematic designator C503)
C503_2 "C_0603_22UF_20P_10V_X7R" C0603 4422.84,5017.48 r0 top (schematic designator C503)
C503_3 "C_0603_22UF_20P_10V_X7R" C0603 5522.83,5014 r0 top (schematic designator C503)
C503_4 "C_0603_22UF_20P_10V_X7R" C0603 4550.76,7413.89 r270 top (schematic designator C503)
C505_1 "C_0603_220NF_10P_25V_X7R" C0603 4622.97,5938.51 r0 top (schematic designator C505)
C505_2 "C_0603_220NF_10P_25V_X7R" C0603 4800.39,5089.27 r90 top (schematic designator C505)
C505_3 "C_0603_220NF_10P_25V_X7R" C0603 5900.39,5085.79 r90 top (schematic designator C505)
C505_4 "C_0603_220NF_10P_25V_X7R" C0603 4622.55,7036.33 r0 top (schematic designator C505)
C506_1 "C_0603_1NF_10P_100V_X7R" C0603 4721.7,5938.51 r0 top (schematic designator C506)
C506_2 "C_0603_1NF_10P_100V_X7R" C0603 4800.39,5188 r90 top (schematic designator C506)
C506_3 "C_0603_1NF_10P_100V_X7R" C0603 5900.39,5184.52 r90 top (schematic designator C506)
C506_4 "C_0603_1NF_10P_100V_X7R" C0603 4721.28,7036.33 r0 top (schematic designator C506)
C507_1 "C_0603_0P1UF_10P_100V_X7R" C0603 4858.83,6038.15 r270 bottom (schematic designator C507)
C507_2 "C_0603_0P1UF_10P_100V_X7R" C0603 4682.72,5324.96 r0 bottom (schematic designator C507)
C507_3 "C_0603_0P1UF_10P_100V_X7R" C0603 5782.72,5321.48 r0 bottom (schematic designator C507)
C507_4 "C_0603_0P1UF_10P_100V_X7R" C0603 4858.24,7154.01 r270 bottom (schematic designator C507)
C508_1 "C_0603_1NF_10P_50V_X7R" C0603 4789.71,5946.31 r0 bottom (schematic designator C508)
C508_2 "C_0603_1NF_10P_50V_X7R" C0603 4774.55,5255.84 r90 bottom (schematic designator C508)
C508_3 "C_0603_1NF_10P_50V_X7R" C0603 5874.55,5252.36 r90 bottom (schematic designator C508)
C508_4 "C_0603_1NF_10P_50V_X7R" C0603 4789.12,7062.18 r0 bottom (schematic designator C508)
C509_1 "C_0805_470NF_10P_100V_C0G" C0805 4423.41,5978.9 r90 top (schematic designator C509)
C509_2 "C_0805_470NF_10P_100V_C0G" C0805 4760,4889.71 r180 top (schematic designator C509)
C509_3 "C_0805_470NF_10P_100V_C0G" C0805 5861.02,4892.07 r180 top (schematic designator C509)
C509_4 "C_0805_470NF_10P_100V_C0G" C0805 4424.77,7077.28 r90 top (schematic designator C509)
C1001_1 "C_1210_1UF_10P_100V_X7R" C1210 3659.15,5947.62 r0 top (schematic designator C1001)
C1001_2 "C_1210_1UF_10P_100V_X7R" C1210 4750,4138.16 r90 top (schematic designator C1001)
C1001_3 "C_1210_1UF_10P_100V_X7R" C1210 5846.66,4133.87 r90 top (schematic designator C1001)
C1001_4 "C_1210_1UF_10P_100V_X7R" C1210 3658.56,7084.8 r0 top (schematic designator C1001)
C1002_1 "C_0603_0P1UF_10P_100V_X7R" C0603 3865.39,5997.87 r180 top (schematic designator C1002)
C1002_2 "C_0603_0P1UF_10P_100V_X7R" C0603 4699.75,4344.41 r270 top (schematic designator C1002)
C1002_3 "C_0603_0P1UF_10P_100V_X7R" C0603 5796.41,4340.12 r270 top (schematic designator C1002)
C1002_4 "C_0603_0P1UF_10P_100V_X7R" C0603 3864.81,7135.05 r180 top (schematic designator C1002)
C1003_1 "C_0603_0P1UF_10P_100V_X7R" C0603 3699.8,6081.44 r0 top (schematic designator C1003)
C1003_2 "C_0603_0P1UF_10P_100V_X7R" C0603 4616.18,4178.82 r90 top (schematic designator C1003)
C1003_3 "C_0603_0P1UF_10P_100V_X7R" C0603 5712.84,4174.53 r90 top (schematic designator C1003)
C1003_4 "C_0603_0P1UF_10P_100V_X7R" C0603 3699.22,7218.62 r0 top (schematic designator C1003)
C1004_1 "C_0603_1UF_10P_25V_X7R" C0603 3699.8,6167.62 r0 top (schematic designator C1004)
C1004_2 "C_0603_1UF_10P_25V_X7R" C0603 4530,4178.82 r90 top (schematic designator C1004)
C1004_3 "C_0603_1UF_10P_25V_X7R" C0603 5626.66,4174.53 r90 top (schematic designator C1004)
C1004_4 "C_0603_1UF_10P_25V_X7R" C0603 3699.22,7304.8 r0 top (schematic designator C1004)
D201 "SMDJ58A" DIONM7959X262N 5622.2,7670 r180 top
D202 "SMDJ58A" DIONM7959X262N 6387.8,7650 r0 top
D203 "SMDJ58A" DIONM7959X262N 5996.03,7239.83 r90 bottom
D401 "1SMB5945BT3G" ONSC-SMB-2-403A-03_H_V 5270,6789.05 r270 top
D402 "SZMM5Z15VT1G" SOD-523_0P9X1P3_ONS 5395.28,5918.1 r270 top
D403 "SZMM5Z15VT1G" SOD-523_0P9X1P3_ONS 5303.85,5918.33 r270 top
D404 "SMD110PL-TP" SODFL3616X135N 5240,6520 r270 top
D501_1 "SMLJ58AQ-TP" DIOM7959X282N 4843.1,6548.03 r180 top (schematic designator D501)
D501_2 "SMLJ58AQ-TP" DIOM7959X282N 4190.87,5309.4 r270 top (schematic designator D501)
D501_3 "SMLJ58AQ-TP" DIOM7959X282N 5290.87,5305.91 r270 top (schematic designator D501)
D501_4 "SMLJ58AQ-TP" DIOM7959X282N 4842.67,7645.86 r180 top (schematic designator D501)
D502_1 "DFLS1100-7" DIOD-POWERDI123-2_V 4217.19,5978.9 r180 top (schematic designator D502)
D502_2 "DFLS1100-7" DIOD-POWERDI123-2_V 4760,4683.48 r270 top (schematic designator D502)
D502_3 "DFLS1100-7" DIOD-POWERDI123-2_V 5860,4680 r270 top (schematic designator D502)
D502_4 "DFLS1100-7" DIOD-POWERDI123-2_V 4216.76,7076.73 r180 top (schematic designator D502)
IC501_1 "TPS48111-Q1" SOP50P490X110-20N 4713.1,6108.03 r270 top (schematic designator IC501)
IC501_2 "TPS48111-Q1" SOP50P490X110-20N 4630.87,5179.4 r0 top (schematic designator IC501)
IC501_3 "TPS48111-Q1" SOP50P490X110-20N 5730.87,5175.91 r0 top (schematic designator IC501)
IC501_4 "TPS48111-Q1" SOP50P490X110-20N 4712.67,7205.86 r270 top (schematic designator IC501)
J408 "XT60PW-F" XT60PW-F 3775.95,8063.78 r180 top
J711 "XT30PW-F" XT30PWF 3462.99,5851.26 r90 top
J712 "XT30PW-F" XT30PWF 5971.89,3916.85 r180 top
J715 "XT30PW-F" XT30PWF 3462.99,6384.41 r90 top
J716 "XT30PW-F" XT30PWF 4911.89,3916.85 r180 top
J? "61301511821" 61301511821 6570,7270 r270 top
"LEFT ARM" "XT30PW-F" XT30PWF 3462.99,6917.56 r90 top
"LEFT ARM SENSOR" "43045-0600" 43045-06(00,01,02,10) 3217.95,8271.89 r270 top (schematic designator J?)
"LEFT LEG" "XT30PW-F" XT30PWF 4381.89,3916.85 r180 top
"LEFT LEG EFUSE" "43045-0400" FP-43045-0400-MFG#1 3086.45,4400 r270 top
LEFT_ARM_EFUSE "43045-0400" FP-43045-0400-MFG#2 3083.98,7922.21 r270 top
PROTECT "43045-0400" FP-43045-0400-MFG#1 3083.98,7492.21 r270 top
"PROTECT OUT" "XT60PW-F" XT60PW-F 4414.25,8063.78 r180 top
Q201 "Trans_Infineon_IPT015N10N5_eec" Infineon_IPT015N10N5_0 5780,7142.68 r180 top
Q202 "Trans_Infineon_IPT015N10N5_eec" Infineon_IPT015N10N5_0 6233.62,7142.68 r180 top
Q401 "Trans_Infineon_IPT015N10N5_eec" Infineon_IPT015N10N5_0 5780,6570 r0 top
Q402 "Trans_Infineon_IPT015N10N5_eec" Infineon_IPT015N10N5_0 6233.62,6570 r0 top
Q403 "Trans_Infineon_IPT015N10N5_eec" Infineon_IPT015N10N5_0 6233.62,5972.68 r180 top
Q404 "Trans_Infineon_IPT015N10N5_eec" Infineon_IPT015N10N5_0 5780,5972.68 r180 top
Q501_1 "IPD068N10N3 G" INF-PG-TO252-3-11_A_L 4242.31,6218.03 r180 top (schematic designator Q501)
Q501_2 "IPD068N10N3 G" INF-PG-TO252-3-11_A_L 4520.87,4708.6 r270 top (schematic designator Q501)
Q501_3 "IPD068N10N3 G" INF-PG-TO252-3-11_A_L 5620.87,4705.12 r270 top (schematic designator Q501)
Q501_4 "IPD068N10N3 G" INF-PG-TO252-3-11_A_L 4241.88,7315.86 r180 top (schematic designator Q501)
Q502_1 "NVMFS015N10MCLT1G" FP-488AA-MFG 4483.5,5771.45 r270 top (schematic designator Q502)
Q502_2 "NVMFS015N10MCLT1G" FP-488AA-MFG 4967.45,4949.79 r0 top (schematic designator Q502)
Q502_3 "NVMFS015N10MCLT1G" FP-488AA-MFG 6067.45,4946.31 r0 top (schematic designator Q502)
Q502_4 "NVMFS015N10MCLT1G" FP-488AA-MFG 4483.07,6869.28 r270 top (schematic designator Q502)
Q503_1 "NVMFS015N10MCLT1G" FP-488AA-MFG 4187.16,5772.28 r90 top (schematic designator Q503)
Q503_2 "NVMFS015N10MCLT1G" FP-488AA-MFG 4966.63,4653.45 r180 top (schematic designator Q503)
Q503_3 "NVMFS015N10MCLT1G" FP-488AA-MFG 6066.63,4649.97 r180 top (schematic designator Q503)
Q503_4 "NVMFS015N10MCLT1G" FP-488AA-MFG 4186.73,6870.1 r90 top (schematic designator Q503)
Q504_1 "MMBT3904" FAIR-SOT23-3_V 4661.06,5997.5 r270 bottom (schematic designator Q504)
Q504_2 "MMBT3904" FAIR-SOT23-3_V 4723.37,5127.19 r0 bottom (schematic designator Q504)
Q504_3 "MMBT3904" FAIR-SOT23-3_V 5823.37,5123.71 r0 bottom (schematic designator Q504)
Q504_4 "MMBT3904" FAIR-SOT23-3_V 4660.47,7113.36 r270 bottom (schematic designator Q504)
R201 "R_0603_100R_1P_0P1W" R0603 5935.41,7724.8 r180 top
R202 "R_0603_100R_1P_0P1W" R0603 6054.1,7663.44 r0 top
R203 "R_0603_22K_1P_0P1W" R0603 6287.95,6870 r180 bottom
R204 "R_0603_22K_1P_0P1W" R0603 6402.09,6870 r180 bottom
R205 "R_0603_22K_1P_0P1W" R0603 6287.95,6970 r180 bottom
R206 "R_0603_22K_1P_0P1W" R0603 6402.09,6970 r180 bottom
R207 "R_0603_22K_1P_0P1W" R0603 6287.95,7070 r180 bottom
R208 "R_0603_22K_1P_0P1W" R0603 6402.09,7070 r180 bottom
R401 "R_0603_464K_1P_0P1W" R0603 5439.09,6350 r90 top
R402 "R_0603_6R65K_1P_0P1W" R0603 5379.29,6350 r90 top
R403 "R_0603_10K_1P_0P1W" R0603 5434.61,6439.88 r180 top
R404 "R_2512_2R2K_1P_2W" R2512 5450,6810 r90 top
R405 "R_2512_1mR3_1P_3W" R2512 5340,5710 r270 top
R406 "R_0603_442K_1P_0P1W" R0603 5195.02,6079.06 r270 top
R407 "R_0603_10K_1P_0P1W" R0603 5195.02,6189.06 r270 top
R408 "R_0603_470R_1P_0P1W" R0603 5340,6461.65 r90 top
R409 "R_0603_10R_1P_0P1W" R0603 5434.61,6499.09 r180 top
R410 "R_0603_10R_1P_0P1W" R0603 5434.61,6599.09 r180 top
R413 "R_0603_22K_1P_0P1W" R0603 6287.95,7170 r180 bottom
R413_1 "R_0603_22K_1P_0P1W" R0603 6287.95,6670 r180 bottom (schematic designator R413)
R413_2 "R_0603_22K_1P_0P1W" R0603 6400,6620 r180 bottom (schematic designator R413)
R413_3 "R_0603_22K_1P_0P1W" R0603 6287.95,6620 r180 bottom (schematic designator R413)
R413_4 "R_0603_22K_1P_0P1W" R0603 6186.19,6620 r180 bottom (schematic designator R413)
R414 "R_0603_22K_1P_0P1W" R0603 6402.09,7170 r180 bottom
R414_1 "R_0603_22K_1P_0P1W" R0603 6402.88,6670 r180 bottom (schematic designator R414)
R414_2 "R_0603_22K_1P_0P1W" R0603 6490,6595.39 r90 bottom (schematic designator R414)
R414_3 "R_0603_22K_1P_0P1W" R0603 6490.79,6445.39 r270 bottom (schematic designator R414)
R414_4 "R_0603_22K_1P_0P1W" R0603 6490,6345.39 r270 bottom (schematic designator R414)
R415 "R_0603_10K_1P_0P1W" R0603 5319.49,6350 r270 top
R416 "R_0603_10K_1P_0P1W" R0603 5259.68,6350 r270 top
R501_1 "R_0603_470K_1P_0P1W" R0603 4933.1,6288.03 r0 top (schematic designator R501)
R501_2 "R_0603_470K_1P_0P1W" R0603 4450.87,5399.4 r90 top (schematic designator R501)
R501_3 "R_0603_470K_1P_0P1W" R0603 5550.87,5395.91 r90 top (schematic designator R501)
R501_4 "R_0603_470K_1P_0P1W" R0603 4932.67,7385.86 r0 top (schematic designator R501)
R502_1 "R_0603_16K2_0P1_0P1W" R0603 4849.62,6318.03 r270 top (schematic designator R502)
R502_2 "R_0603_16K2_0P1_0P1W" R0603 4420.87,5315.91 r0 top (schematic designator R502)
R502_3 "R_0603_16K2_0P1_0P1W" R0603 5520.87,5312.43 r0 top (schematic designator R502)
R502_4 "R_0603_16K2_0P1_0P1W" R0603 4849.19,7415.86 r270 top (schematic designator R502)
R503_1 "R_0603_14K7_0P1_0P1W" R0603 4671.18,6318.03 r270 top (schematic designator R503)
R503_2 "R_0603_14K7_0P1_0P1W" R0603 4420.87,5137.48 r0 top (schematic designator R503)
R503_3 "R_0603_14K7_0P1_0P1W" R0603 5520.87,5134 r0 top (schematic designator R503)
R503_4 "R_0603_14K7_0P1_0P1W" R0603 4670.76,7415.86 r270 top (schematic designator R503)
R504_1 "R_0603_66K_1P_0P1W" R0603 4611.18,6318.03 r270 top (schematic designator R504)
R504_2 "R_0603_66K_1P_0P1W" R0603 4420.87,5077.48 r0 top (schematic designator R504)
R504_3 "R_0603_66K_1P_0P1W" R0603 5520.87,5074 r0 top (schematic designator R504)
R504_4 "R_0603_66K_1P_0P1W" R0603 4610.76,7415.86 r270 top (schematic designator R504)
R505_1 "R_0603_1K_1P_0P1W" R0603 4791.18,6318.03 r270 top (schematic designator R505)
R505_2 "R_0603_1K_1P_0P1W" R0603 4420.87,5257.48 r0 top (schematic designator R505)
R505_3 "R_0603_1K_1P_0P1W" R0603 5520.87,5254 r0 top (schematic designator R505)
R505_4 "R_0603_1K_1P_0P1W" R0603 4790.76,7415.86 r270 top (schematic designator R505)
R506_1 "R_0603_1K_1P_0P1W" R0603 4731.18,6318.03 r270 top (schematic designator R506)
R506_2 "R_0603_1K_1P_0P1W" R0603 4420.87,5197.48 r0 top (schematic designator R506)
R506_3 "R_0603_1K_1P_0P1W" R0603 5520.87,5194 r0 top (schematic designator R506)
R506_4 "R_0603_1K_1P_0P1W" R0603 4730.76,7415.86 r270 top (schematic designator R506)
R508_1 "R_0603_100R_1P_0P1W" R0603 4937.35,6013.54 r0 bottom (schematic designator R508)
R508_2 "R_0603_100R_1P_0P1W" R0603 4707.32,5403.48 r90 bottom (schematic designator R508)
R508_3 "R_0603_100R_1P_0P1W" R0603 5807.32,5400 r90 bottom (schematic designator R508)
R508_4 "R_0603_100R_1P_0P1W" R0603 4936.76,7129.41 r0 bottom (schematic designator R508)
R509_1 "R_0603_7K5_1P_0P1W" R0603 4937.19,5948.9 r0 top (schematic designator R509)
R509_2 "R_0603_7K5_1P_0P1W" R0603 4790,5403.48 r90 top (schematic designator R509)
R509_3 "R_0603_7K5_1P_0P1W" R0603 5890,5400 r90 top (schematic designator R509)
R509_4 "R_0603_7K5_1P_0P1W" R0603 4936.76,7046.73 r0 top (schematic designator R509)
R510_1 "R_0603_100R_1P_0P1W" R0603 4937.19,5888.9 r0 top (schematic designator R510)
R510_2 "R_0603_100R_1P_0P1W" R0603 4850,5403.48 r90 top (schematic designator R510)
R510_3 "R_0603_100R_1P_0P1W" R0603 5950,5400 r90 top (schematic designator R510)
R510_4 "R_0603_100R_1P_0P1W" R0603 4936.76,6986.73 r0 top (schematic designator R510)
R511_1 "R_2512_1mR_1P_3W" R2512 4857.19,5758.9 r180 top (schematic designator R511)
R511_2 "R_2512_1mR_1P_3W" R2512 4980,5323.48 r270 top (schematic designator R511)
R511_3 "R_2512_1mR_1P_3W" R2512 6080,5320 r270 top (schematic designator R511)
R511_4 "R_2512_1mR_1P_3W" R2512 4856.76,6856.73 r180 top (schematic designator R511)
R512_1 "R_2512_220R_1P_2W" R2512 4171.24,6456.54 r0 top (schematic designator R512)
R512_2 "R_2512_220R_1P_2W" R2512 4282.36,4637.53 r90 top (schematic designator R512)
R512_3 "R_2512_220R_1P_2W" R2512 5382.36,4634.05 r90 top (schematic designator R512)
R512_4 "R_2512_220R_1P_2W" R2512 4170.81,7554.37 r0 top (schematic designator R512)
R513_1 "R_2512_220R_1P_2W" R2512 4171.24,6648.9 r0 top (schematic designator R513)
R513_2 "R_2512_220R_1P_2W" R2512 4090,4637.53 r90 top (schematic designator R513)
R513_3 "R_2512_220R_1P_2W" R2512 5190,4634.05 r90 top (schematic designator R513)
R513_4 "R_2512_220R_1P_2W" R2512 4170.81,7746.73 r0 top (schematic designator R513)
R514_1 "R_0603_220R_1P_0P1W" R0603 4526.65,5968.9 r270 top (schematic designator R514)
R514_2 "R_0603_220R_1P_0P1W" R0603 4770,4992.94 r0 top (schematic designator R514)
R514_3 "R_0603_220R_1P_0P1W" R0603 5870,4989.46 r0 top (schematic designator R514)
R514_4 "R_0603_220R_1P_0P1W" R0603 4526.22,7066.73 r270 top (schematic designator R514)
R515_1 "R_0603_10K_1P_0P1W" R0603 4532.58,6098.9 r0 top (schematic designator R515)
R515_2 "R_0603_10K_1P_0P1W" R0603 4640,4998.88 r90 top (schematic designator R515)
R515_3 "R_0603_10K_1P_0P1W" R0603 5740,4995.39 r90 top (schematic designator R515)
R515_4 "R_0603_10K_1P_0P1W" R0603 4532.15,7196.73 r0 top (schematic designator R515)
R516_1 "R_0603_10K_1P_0P1W" R0603 4532.58,6154.57 r0 top (schematic designator R516)
R516_2 "R_0603_10K_1P_0P1W" R0603 4584.33,4998.88 r90 top (schematic designator R516)
R516_3 "R_0603_10K_1P_0P1W" R0603 5684.33,4995.39 r90 top (schematic designator R516)
R516_4 "R_0603_10K_1P_0P1W" R0603 4532.15,7252.4 r0 top (schematic designator R516)
R1002_1 "R_2512_1R_1P_1W" R2512 3837.52,5729.35 r180 top (schematic designator R1002)
R1002_2 "R_2512_1R_1P_1W" R2512 4968.27,4316.54 r270 top (schematic designator R1002)
R1002_3 "R_2512_1R_1P_1W" R2512 6064.93,4312.25 r270 top (schematic designator R1002)
R1002_4 "R_2512_1R_1P_1W" R2512 3840,6870 r180 top (schematic designator R1002)
R1003_1 "R_0603_10R_1P_0P1W" R0603 3835.7,5907.62 r270 top (schematic designator R1003)
R1003_2 "R_0603_10R_1P_0P1W" R0603 4790,4316.54 r0 top (schematic designator R1003)
R1003_3 "R_0603_10R_1P_0P1W" R0603 5886.66,4312.25 r0 top (schematic designator R1003)
R1003_4 "R_0603_10R_1P_0P1W" R0603 3836.93,7044.8 r270 top (schematic designator R1003)
R1004_1 "R_0603_10R_1P_0P1W" R0603 3890.98,5907.62 r270 top (schematic designator R1004)
R1004_2 "R_0603_10R_1P_0P1W" R0603 4790,4370 r0 top (schematic designator R1004)
R1004_3 "R_0603_10R_1P_0P1W" R0603 5886.66,4365.71 r0 top (schematic designator R1004)
R1004_4 "R_0603_10R_1P_0P1W" R0603 3890.4,7044.8 r270 top (schematic designator R1004)
R1005_1 "R_0603_4K7_1P_0P1W" R0603 3789.8,6357.62 r270 top (schematic designator R1005)
R1005_2 "R_0603_4K7_1P_0P1W" R0603 4340,4268.82 r0 top (schematic designator R1005)
R1005_3 "R_0603_4K7_1P_0P1W" R0603 5436.66,4264.53 r0 top (schematic designator R1005)
R1005_4 "R_0603_4K7_1P_0P1W" R0603 3789.22,7494.8 r270 top (schematic designator R1005)
R1006_1 "R_0603_4K7_1P_0P1W" R0603 3857.74,6357.62 r270 top (schematic designator R1006)
R1006_2 "R_0603_4K7_1P_0P1W" R0603 4340,4336.76 r0 top (schematic designator R1006)
R1006_3 "R_0603_4K7_1P_0P1W" R0603 5436.66,4332.47 r0 top (schematic designator R1006)
R1006_4 "R_0603_4K7_1P_0P1W" R0603 3857.16,7494.8 r270 top (schematic designator R1006)
R1008_1 "R_0603_4K7_1P_0P1W" R0603 3699.8,6250.73 r180 top (schematic designator R1008)
R1008_2 "R_0603_4K7_1P_0P1W" R0603 4446.89,4178.82 r270 top (schematic designator R1008)
R1008_3 "R_0603_4K7_1P_0P1W" R0603 5543.55,4174.53 r270 top (schematic designator R1008)
R1008_4 "R_0603_4K7_1P_0P1W" R0603 3699.22,7387.91 r180 top (schematic designator R1008)
R1009_1 "R_0603_1K_1P_0P1W" R0603 6490,6245.39 r270 bottom (schematic designator R1009)
R1009_2 "R_0603_1K_1P_0P1W" R0603 6490,6145.39 r270 bottom (schematic designator R1009)
R1009_3 "R_0603_1K_1P_0P1W" R0603 6490,6045.39 r270 bottom (schematic designator R1009)
R1009_4 "R_0603_1K_1P_0P1W" R0603 6490,5945.39 r270 bottom (schematic designator R1009)
"RIGHT ARM" "XT30PW-F" XT30PWF 3462.99,5318.11 r90 top
"RIGHT ARM EFUSE" "43045-0400" FP-43045-0400-MFG#1 3083.98,3540 r270 top
"RIGHT ARM SENSOR" "43045-0600" 43045-06(00,01,02,10) 3222.63,4761.89 r270 top (schematic designator J?)
"RIGHT LEG" "XT30PW-F" XT30PWF 5441.89,3916.85 r180 top
"RIGHT LEG EFUSE" "43045-0400" FP-43045-0400-MFG#1 3086.19,3970 r270 top
"RIGHT LEG SENSOR" "43045-0600" 43045-06(00,01,02,10) 6528.11,3670.08 r0 top (schematic designator J?)
"RIGHT LEG SENSOR" "43045-0600" 43045-06(00,01,02,10) 3878.11,3666.79 r0 top (schematic designator J?)
U201 "FET_LM5050MK-1/NOPB" DDC0006A_M 5996.03,7841.38 r180 top
U202 "FET_LM5050MK-1/NOPB" DDC0006A_M 5996.03,7533.56 r0 top
U401 "LTC4364IMS-2#PBF" LT-MS-16_M 5340.67,6130 r90 top
U1001_1 "INA228AIDGSR" SOP50P490X110-10N 3835.7,6168.17 r270 top (schematic designator U1001)
U1001_2 "INA228AIDGSR" SOP50P490X110-10N 4529.45,4314.72 r0 top (schematic designator U1001)
U1001_3 "INA228AIDGSR" SOP50P490X110-10N 5626.11,4310.43 r0 top (schematic designator U1001)
U1001_4 "INA228AIDGSR" SOP50P490X110-10N 3835.12,7305.35 r270 top (schematic designator U1001)

## Footprints (in the part's own frame and the unit in brackets; to place one, negate y for a bottom-side part, rotate by r counter-clockwise, add the part's x,y. Pads: shape width x height; smd on the part's side, far side on the other; paste and mask are expansions set on the pad)
43045-06(00,01,02,10) [mm]
  rect 1.52x1.52 hole 1.02: 1(0,0)
  round 1.52 hole 1.02: 2(-3,0) 3(-6,0) 4(0,3) 5(-3,3) 6(-6,3)
  round 3 hole 3 unplated: 7(-3,-4.32)
  silkscreen extent -9.33,-8.72 5,3.52, body extent -9.59,-8.9 3.57,3.34, height 8.69
61301511821 [mm]
  rect 1.53x1.53 hole 1.02: 1(0,0)
  round 1.53 hole 1.02: 2(2.54,0) 3(5.08,0) 4(7.62,0) 5(10.16,0) 6(12.7,0) 7(15.24,0) 8(17.78,0) 9(20.32,0) 10(22.86,0) 11(25.4,0) 12(27.94,0) 13(30.48,0) 14(33.02,0) 15(35.56,0)
  silkscreen extent -2.1,-1.25 37.08,1.25, body extent -1.52,-1.25 37.08,1.25, height 8.75
C0603 [mm]
  rect 0.75x0.8 smd: 1(-0.625,0) 2(0.625,0)
  body extent -0.8,-0.4 0.8,0.4, height 0.81
C0805 [mm]
  rect 1x1.35 smd: 1(-0.9,0) 2(0.9,0)
  silkscreen extent -0.1,-0.58 0.1,0.58, body extent -1,-0.63 1,0.63, height 0.81
C1210 [mm]
  rect 1.6x2.7 smd: 1(-1.5,0) 2(1.5,0)
  body extent -1.6,-1.25 1.6,1.25, height 0.96
CAPAE1030X1050N [mm]
  rect 4.3x2.15 smd: 1(-4.2,0) 2(4.2,0)
  silkscreen extent -6.35,-5.15 5.15,5.15, body extent -5.65,-5.25 5.65,5.25, height 10.5
DDC0006A_M [mm] "SOT23, 6-Leads, Body 3.05x1.75mm, Pitch 0.95mm, IPC Low Density"
  rrect15% 1.2x0.65 smd: 1(-1.475,0.95) 2(-1.475,0) 3(-1.475,-0.95) 4(1.475,-0.95) 5(1.475,0) 6(1.475,0.95)
  silkscreen extent -1.6,-1.55 0.5,1.95, body extent -1.43,-1.48 1.43,1.49, height 0.9
DIOD-POWERDI123-2_V [mm] "SOD, 2-Leads, Body 2.8x1.78mm"
  rect 1.05x1.5 smd: 1(-1.525,0)
  rect 2.4x1.5 smd: 2(0.85,0)
  silkscreen extent 2.55,-0.89 2.55,0.89, body extent -1.4,-0.89 1.4,0.89, height 1.01
DIOM7959X282N [mm]
  rect 2.2x3.15 smd: 1(-3.5,0) 2(3.5,0)
  silkscreen extent -4.6,-2.95 3.97,2.95, body extent -4,-3.05 4,3.05, height 2.5
DIONM7959X262N [mm]
  rect 2.2x3.15 smd: 1(-3.5,0) 2(3.5,0)
  silkscreen extent -3.97,-2.95 3.97,2.95, body extent -3.97,-2.95 3.97,2.95, height 2.62
FAIR-SOT23-3_V [mm] "SOT23, 3-Leads, Body 3.12x1.5mm, Pitch 0.95mm"
  rect 1.4x1 smd: 1(-1.1,0.95) 2(-1.1,-0.95) 3(1.1,0)
  silkscreen extent -1.22,-1.55 0.75,2.12, body extent -1.35,-1.56 1.35,1.56, height 1.2
FP-488AA-MFG [mm]
  rect 0.75x1 smd paste+0 mask+0: 1(-1.905,-2.747) 2(-0.635,-2.747) 3(0.635,-2.747) 4(1.905,-2.748)
  round 3.631 smd paste+0 mask+0: 5-6(0.021,0.735)
  Top Layer region: -2.28,-1.282 -2.28,-0.857 -2.775,-0.857 -2.775,0.048 -2.28,0.048 -2.28,3.247 -1.53,3.248 -1.53,2.773 1.53,2.773 1.53,3.247 2.28,3.248 2.28,0.048 2.775,0.048 2.775,-0.857 2.28,-0.857 2.28,-1.282
  silkscreen extent -2.73,-3.95 2.73,3.05, body extent -2.88,-3.35 2.88,3.35, height 0.25
FP-43045-0400-MFG#1 [mm]
  rect 1.57x1.57 hole 1.02 paste-2539.97 mask+0: 1(1.5,3.965)
  round 1.57 hole 1.02 paste-2539.97 mask+0: 2(-1.5,3.965) 3(1.5,6.965) 4(-1.5,6.965)
  round 3 hole 3 unplated paste-2539.97 mask+0: ""(0,-0.355)
  silkscreen extent -5.2,-5.21 5.67,4.96, body extent -5.3,-5.31 5.3,7.85, height 0.25
FP-43045-0400-MFG#2 [mm]
  rect 1.57x1.57 hole 1.02 paste-2539.97 mask+0: 1(1.5,3.965)
  round 1.57 hole 1.02 paste-2539.97 mask+0: 2(-1.5,3.965) 3(1.5,6.965)
  round 1.57 hole 1.02 paste-2539.97 mask-2539.97: 4(-1.5,6.965)
  round 3 hole 3 unplated paste-2539.97 mask+0: ""(0,-0.355)
  silkscreen extent -5.2,-5.21 5.67,4.96, body extent -5.3,-5.31 5.3,7.85, height 0.25
INF-PG-TO252-3-11_A_L [mm] "DPAK, 3-Leads, Body 6.57x6.1mm, Pitch 2.29mm, IPC High Density"
  rect 1.7x0.95 smd: 1(-4.6,2.29) 3(-4.6,-2.29)
  rect 6.8x5.5 smd: 2(2,0)
  silkscreen extent -4.73,-3.35 -1.8,3.44, body extent -2.2,-3.38 4.02,3.38, height 2.41
Infineon_IPT015N10N5_0 [mm]
  rect 0.8x2.8 smd paste-1000 mask+0: 1(-4.2,-5.25)
  rect 0.8x2 smd paste-1000 mask+0: 2-8(-3,-5.65) 2-8(-1.8,-5.65) 2-8(-0.6,-5.65) 2-8(0.6,-5.65) 2-8(1.8,-5.65) 2-8(3,-5.65) 2-8(4.2,-5.65)
  rect 8x0.8 smd paste-1000 mask+0: 2-8(0.6,-4.25)
  rect 10.1x1.4 smd paste-1000 mask+0: Tab(0,5.95)
  rect 8.7x2.9 smd paste-1000 mask+0: Tab(0,3.8)
  rect 9.7x3.7 smd paste-1000 mask+0: Tab(0,0.5)
  silkscreen extent -5.42,-7.32 5.43,5.22, body extent -4.95,-5.33 4.95,6.34, height 2.3
LT-MS-16_M [mm] "SOP, 16-Leads, Body 4.1x3.1mm, Pitch 0.5mm, IPC Low Density"
  oval 1.95x0.3 smd: 1(-2.125,1.75) 2(-2.125,1.25) 3(-2.125,0.75) 4(-2.125,0.25) 5(-2.125,-0.25) 6(-2.125,-0.75) 7(-2.125,-1.25) 8(-2.125,-1.75) 9(2.125,-1.75) 10(2.125,-1.25) 11(2.125,-0.75) 12(2.125,-0.25) 13(2.125,0.25) 14(2.125,0.75) 15(2.125,1.25) 16(2.125,1.75)
  silkscreen extent -2.25,-2.08 0.75,2.57, body extent -1.55,-2.05 1.55,2.05, height 1.1
ONSC-SMB-2-403A-03_H_V [mil] "Molded, 2-Leads, Body 4.6x3.95mm"
  rect 85x107.99 smd: 1(-87.01,0) 2(87.01,0)
  silkscreen extent -125,-79 91,81, body extent -91,-78 91,78, height 95
R0603 [mm]
  rect 0.75x0.8 smd: 1(-0.625,0) 2(0.625,0)
  body extent -0.8,-0.4 0.8,0.4, height 0.46
R2512 [mm]
  rect 1.45x3.3 smd: 1(-2.725,0) 2(2.725,0)
  silkscreen extent -1.6,-1.55 1.6,1.55, body extent -3.15,-1.6 3.15,1.6, height 0.66
SOD-523_0P9X1P3_ONS [mil]
  rect 20x14 smd paste+0 mask+0: 1(-31.5,0) 2(31.5,0)
  silkscreen extent -31,-22 31,22, body extent -34,-17 34,17, height 18
SODFL3616X135N [mm]
  rect 0.74x1.07 smd: 1(-1.775,0) 2(1.775,0)
  silkscreen extent -2.14,-0.83 1.41,0.83, body extent -1.8,-0.8 1.8,0.8, height 1.2
SOP50P490X110-10N [mm]
  rrect25% 1.47x0.28 smd: 1(-2.15,1) 2(-2.15,0.5) 3(-2.15,0) 4(-2.15,-0.5) 5(-2.15,-1) 6(2.15,-1) 7(2.15,-0.5) 8(2.15,0) 9(2.15,0.5) 10(2.15,1)
  silkscreen extent -3.6,-1.5 1.5,1.5, body extent -2.45,-1.5 2.45,1.5, height 1.1
SOP50P490X110-20N [mm]
  rect 1.425x0.3 smd: 1(-2.212,2.25) 2(-2.212,1.75) 3(-2.212,1.25) 4(-2.212,0.75) 5(-2.212,0.25) 6(-2.212,-0.25) 7(-2.212,-0.75) 8(-2.212,-1.25) 9(-2.212,-1.75) 10(-2.212,-2.25) 11(2.212,-2.25) 12(2.212,-1.75) 13(2.212,-1.25) 14(2.212,-0.75) 15(2.212,-0.25) 16(2.212,0.25) 17(2.212,0.75) 18(2.212,1.25) 19(2.212,1.75) 20(2.212,2.25)
  silkscreen extent -2.92,-2.55 1.15,2.75, body extent -2.45,-2.55 2.45,2.55, height 1.1
XT30PWF [mm]
  round 2.55 hole 1.7: 1(0,0) 2(5,0)
  round 1.5 hole 1: 3(-3,5) 4(8,5)
  silkscreen extent -4.15,3 9.15,15, body extent -4.15,-0.96 9.15,13.93, height 5.21
XT60_F [mm]
  round 6 hole 4.3: 1(-3.6,0) 2(3.6,0)
  silkscreen extent -7.85,-4.1 7.85,4.1, body extent -7.8,-4 7.8,4, height 16.8
XT60PW-F [mm]
  round 3.716 hole 2.7: 1(-3.6,0) 2(3.6,0)
  oval 1.3x2.6 hole 0.6 square: S1(-6.75,-6) S2(6.75,-6)
  silkscreen extent -8.4,-15.35 7.75,1.85, body extent -7.75,-15.35 7.75,1.85, height 8.4
XT60PW-M [mm]
  rect 3.716x3.716 / inner round 3.716 / far side rect 3.716x3.716 hole 2.7: 1(3.6,-6)
  round 3.716 hole 2.7: 2(-3.6,-6)
  oval 1.2x2.4 hole 0.6 square: S1(6.75,0) S2(-6.75,0)
  silkscreen extent -7.75,-9.66 7.75,10.35, body extent -7.75,-7.85 7.75,10.35, height 8.4